# Altium PCB VA_HUB_PCB.PcbDoc (part 1 of 12)
Units mil, origin at the board's own origin, x right, y up, seen from the top; angles counter-clockwise.
Board outline 4408 x 3619 mil, 8 copper layers (Top Layer, Routing 1, Routing 2, Power Plane, GND Plane, Routing 3, Routing 4, Bottom Layer), stack 85.156 mil thick; 569 components, 440 nets, 2911 pads, 1518 vias.
Unrouted connection lines stored in the file: 46.
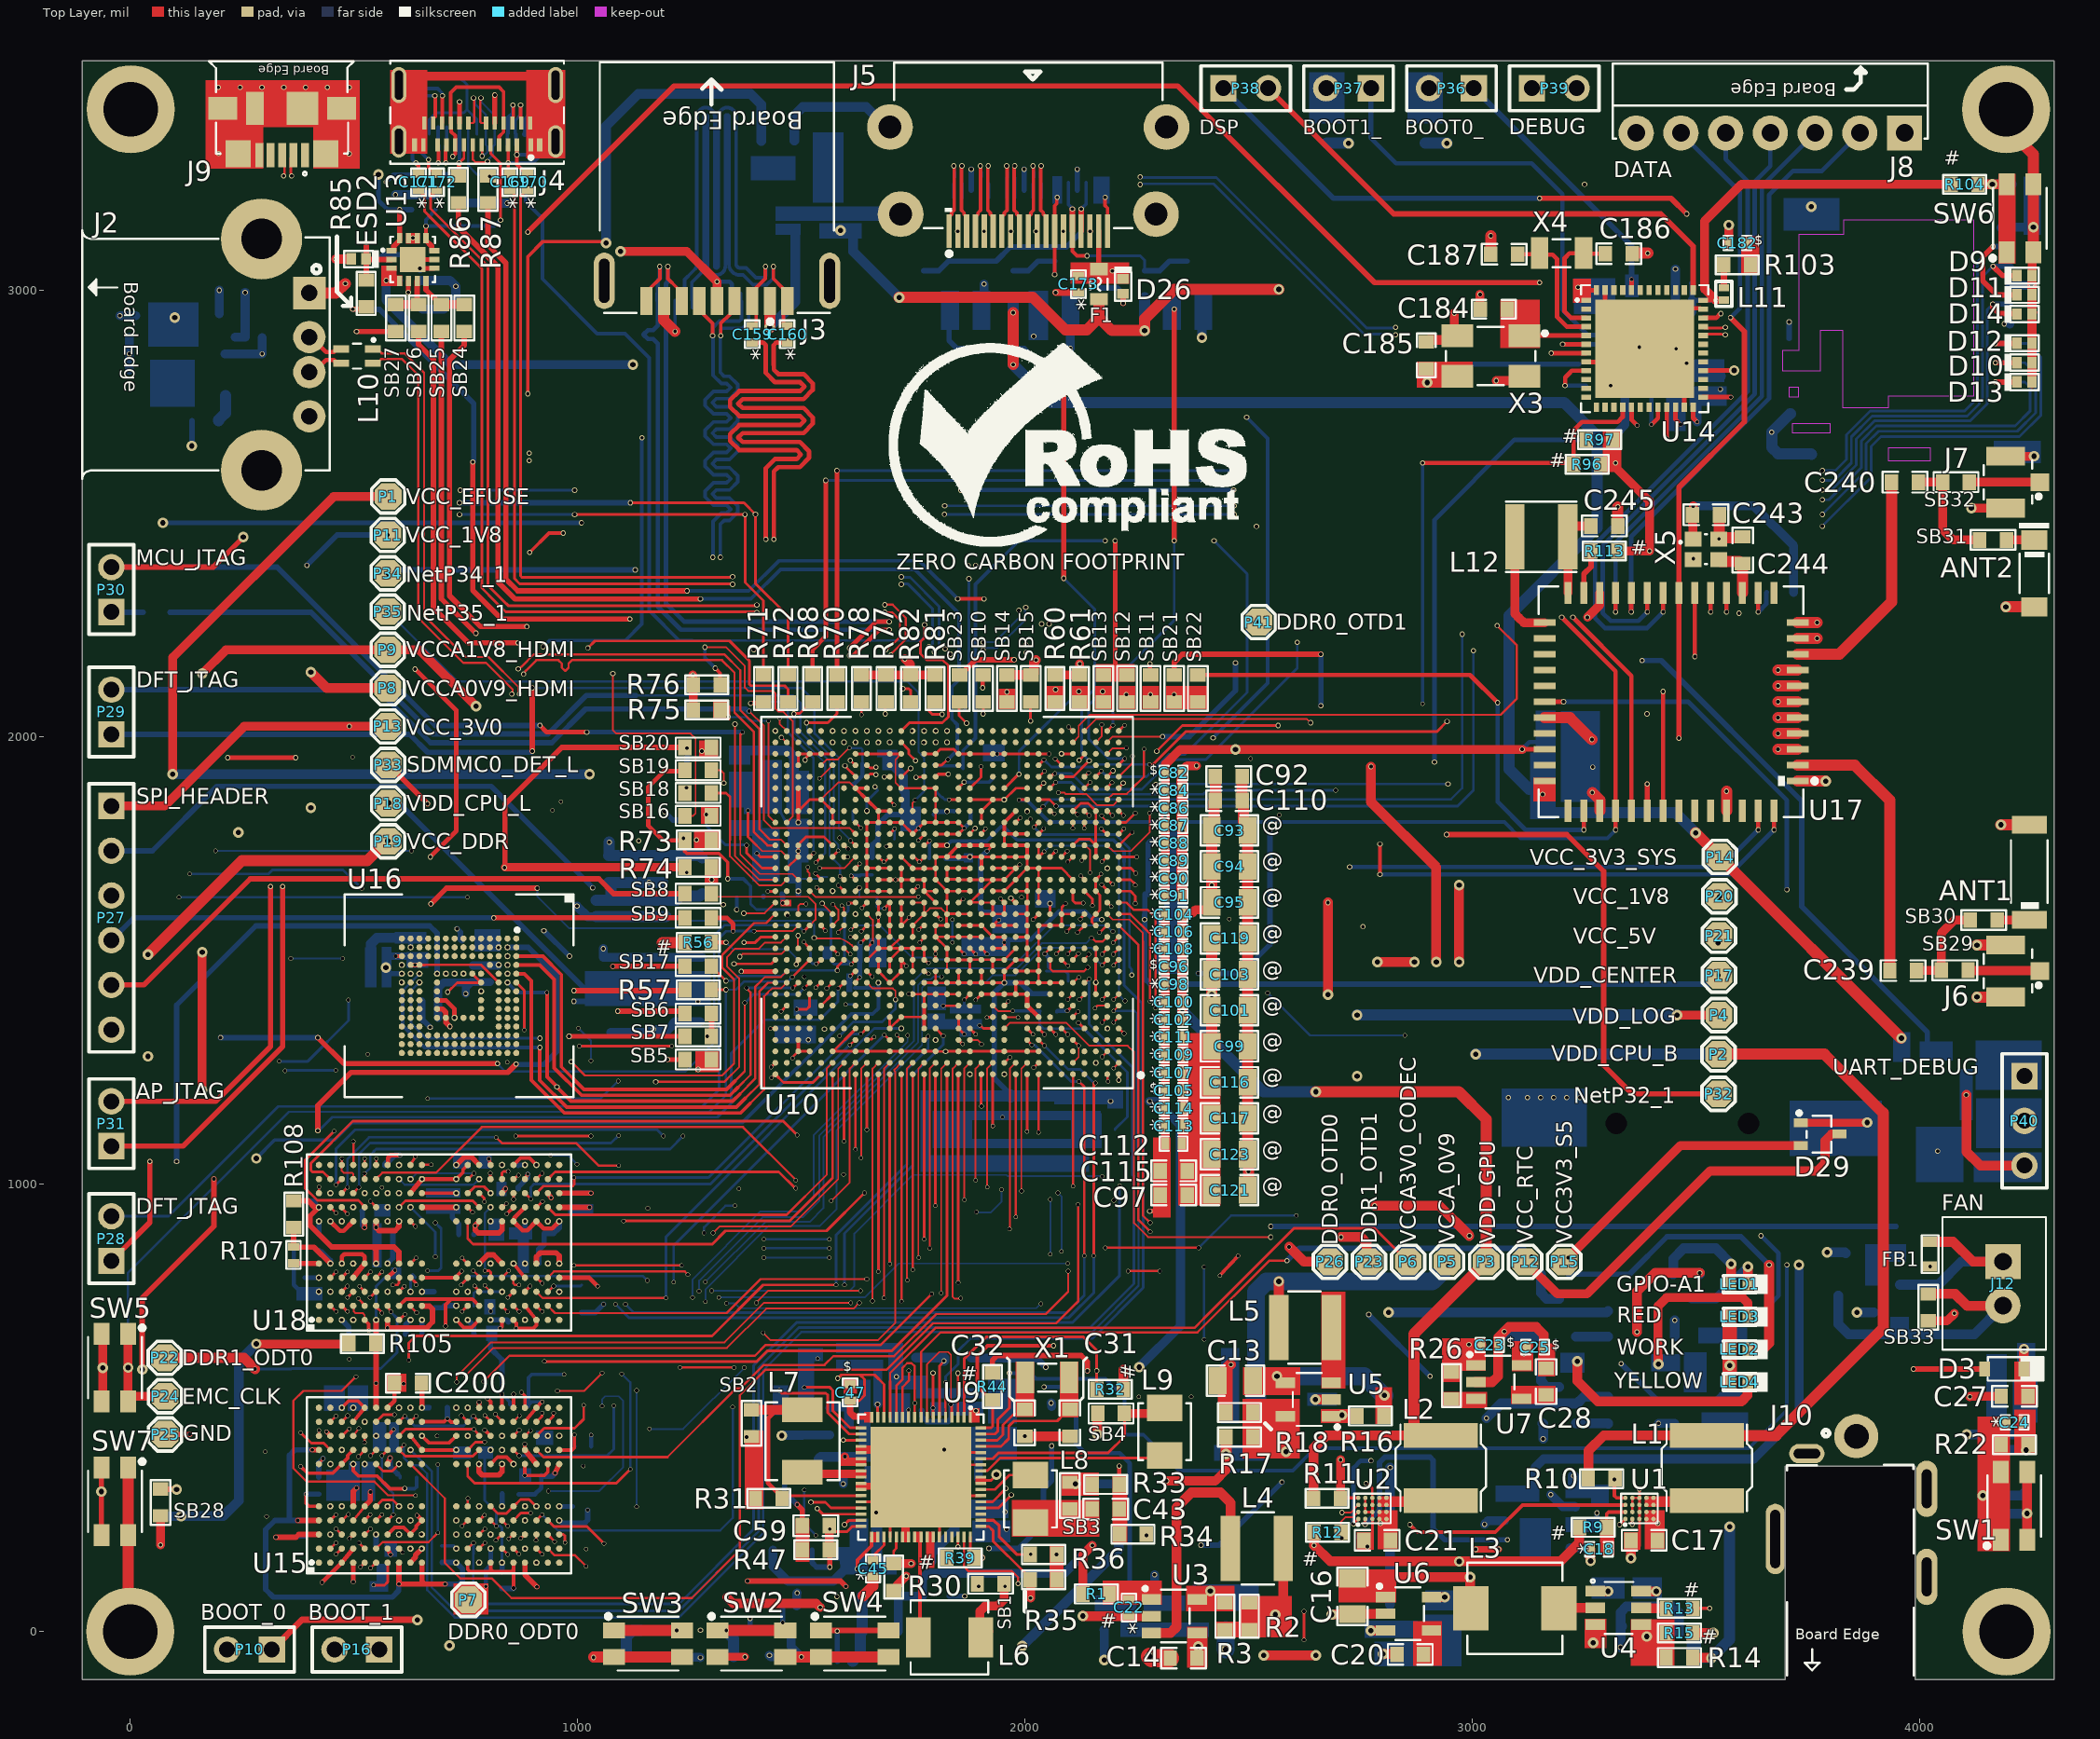
[diagram p0: Top Layer view]
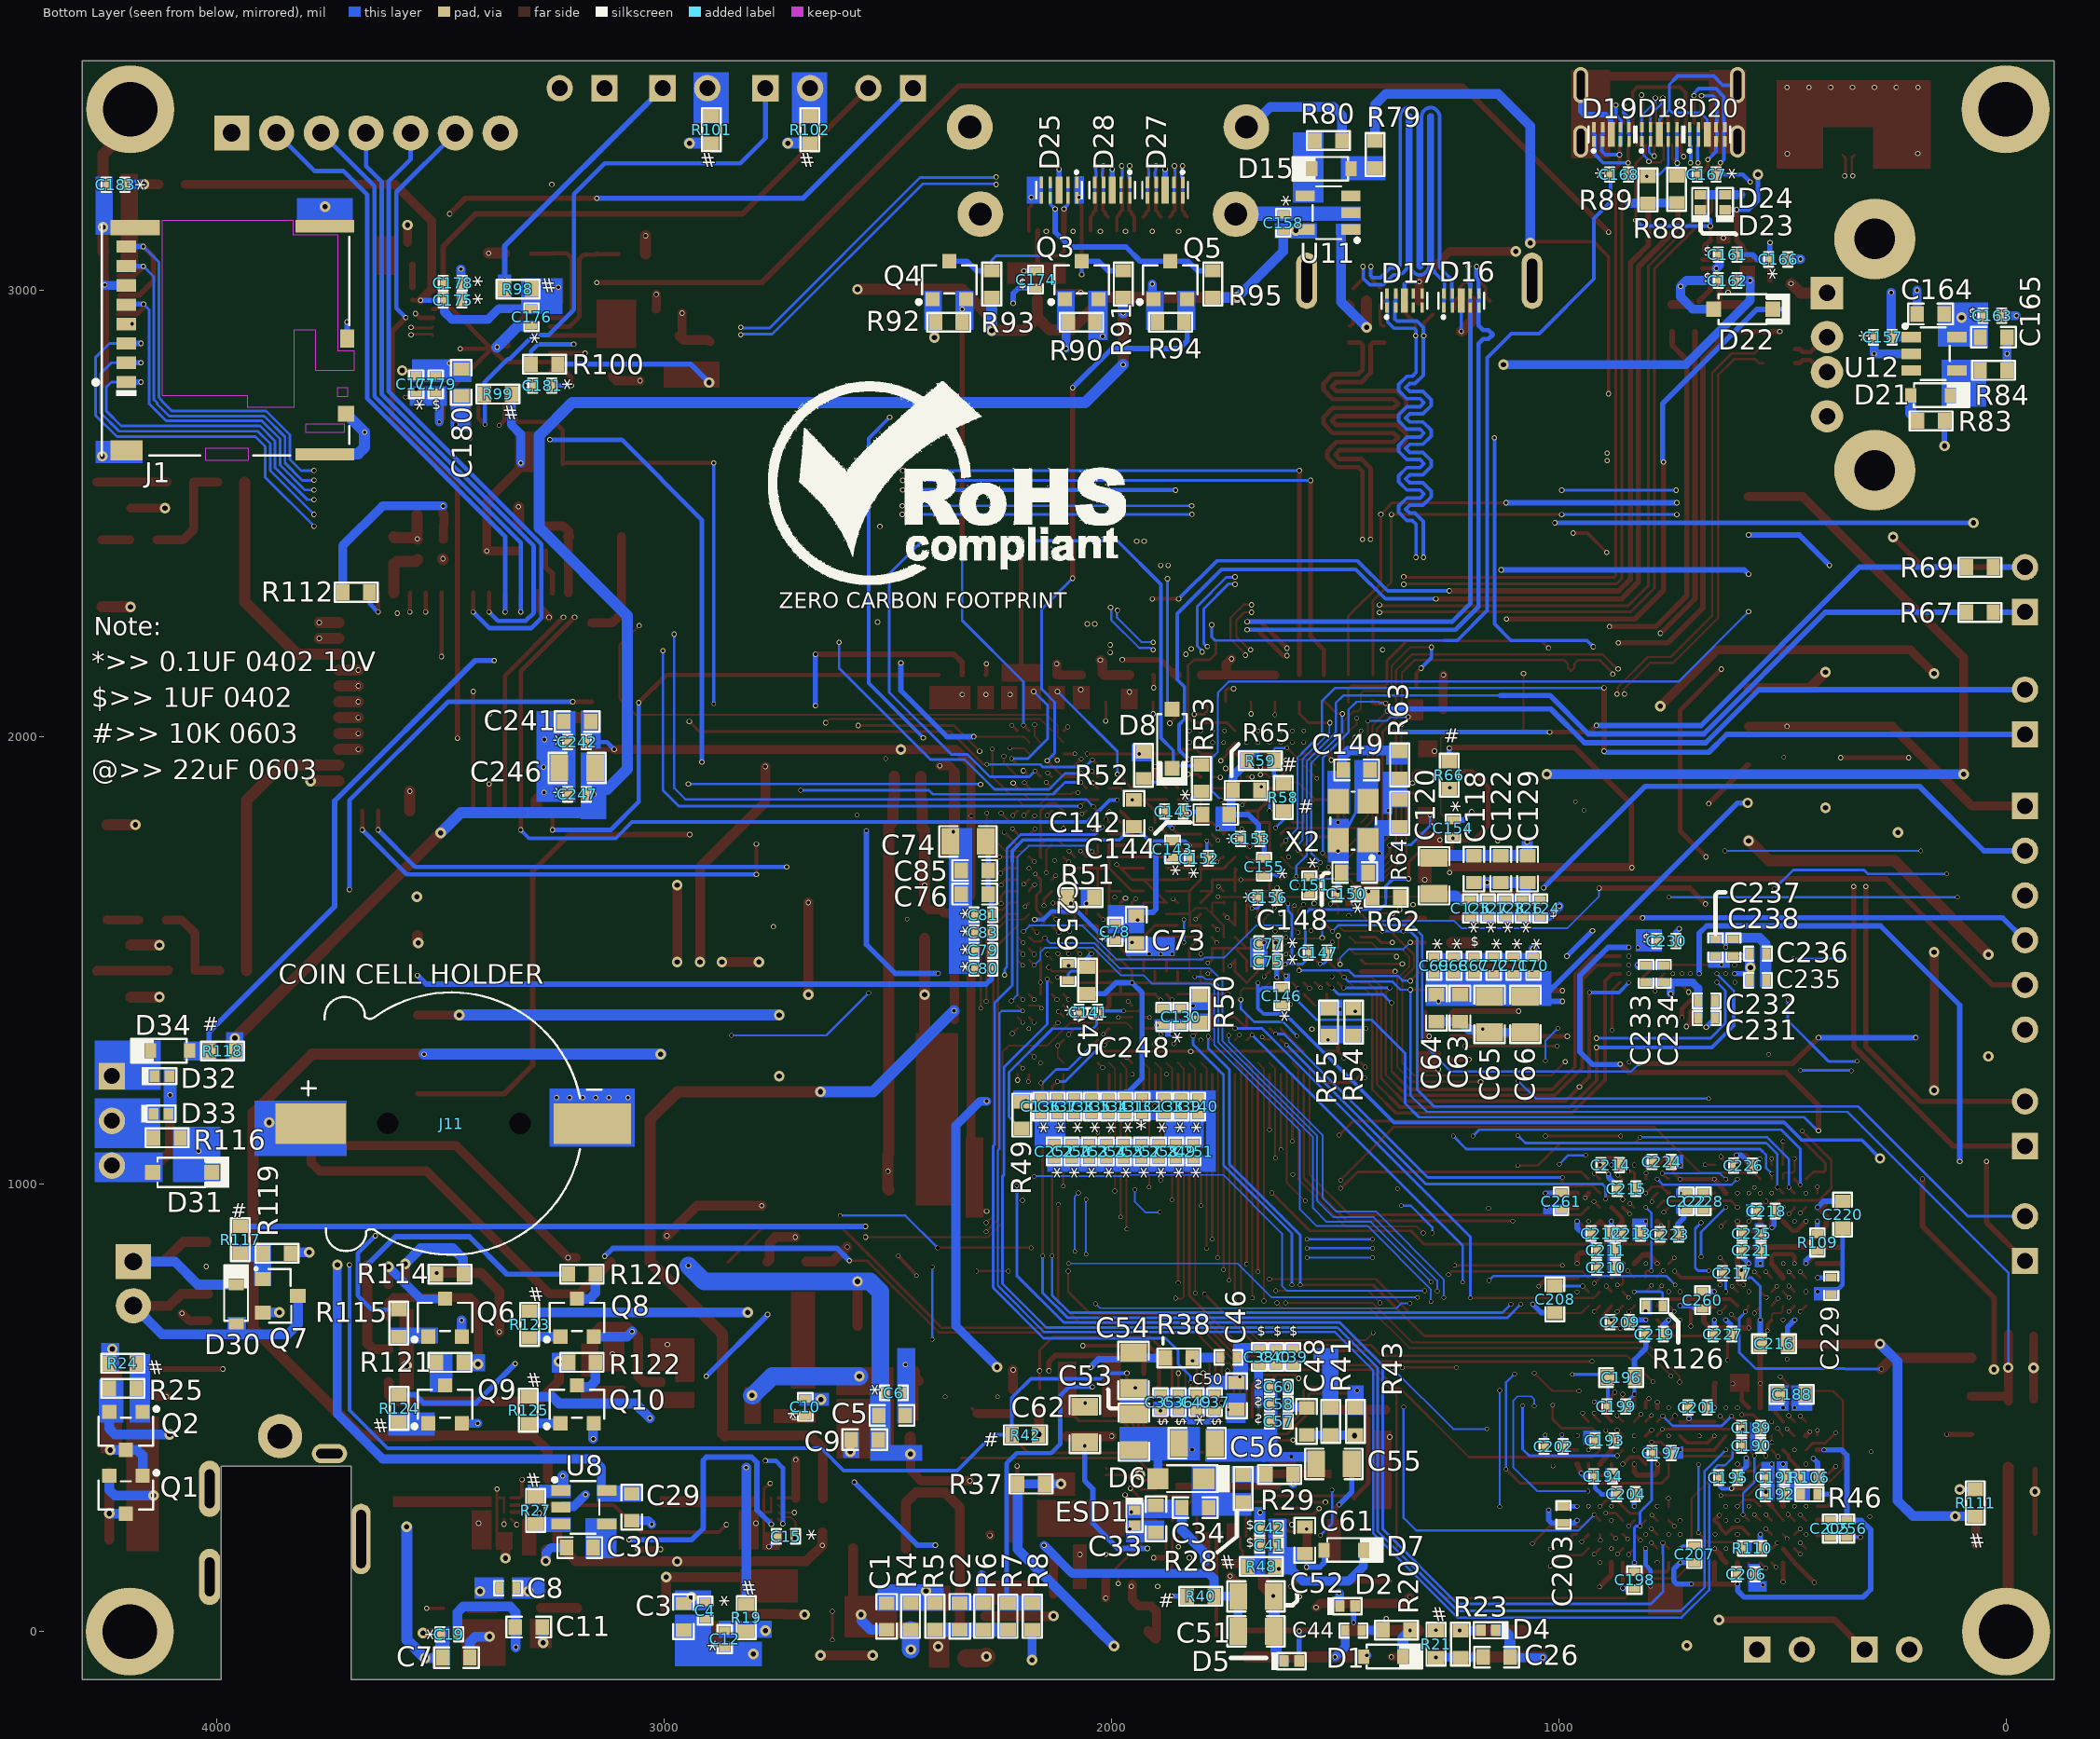
[diagram p1: Bottom Layer view, seen from below]
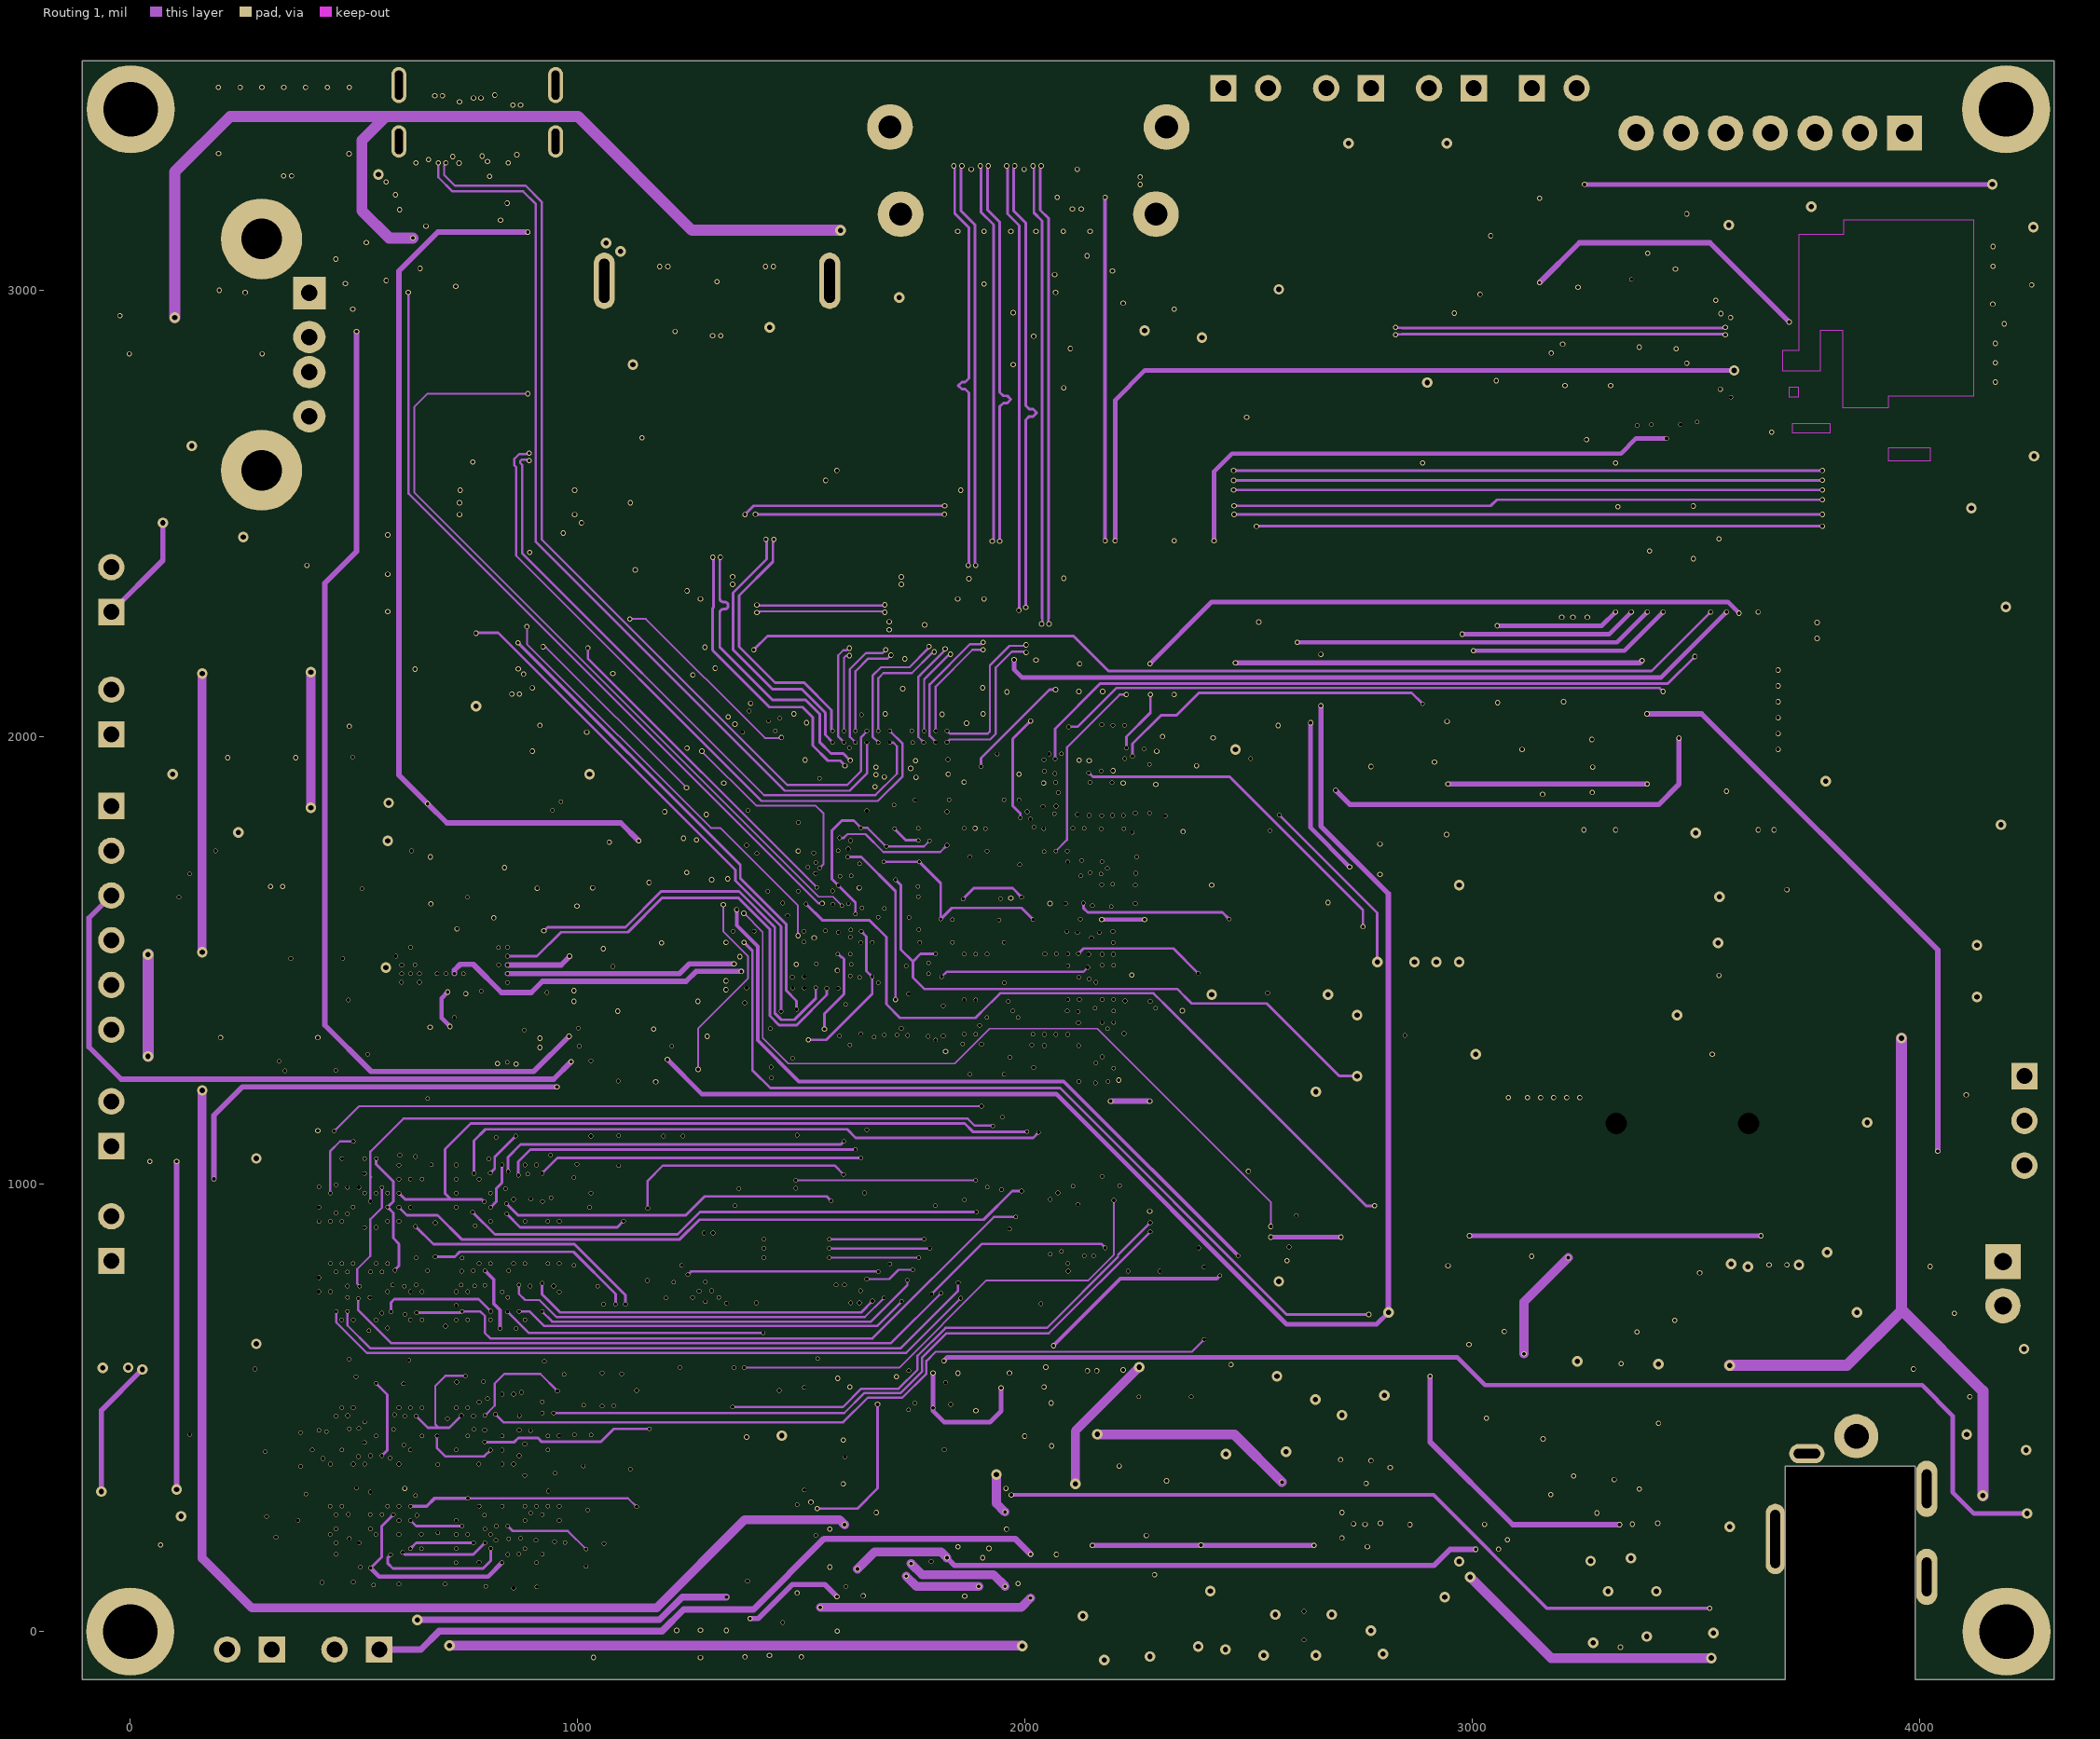
[diagram p2: Routing 1]
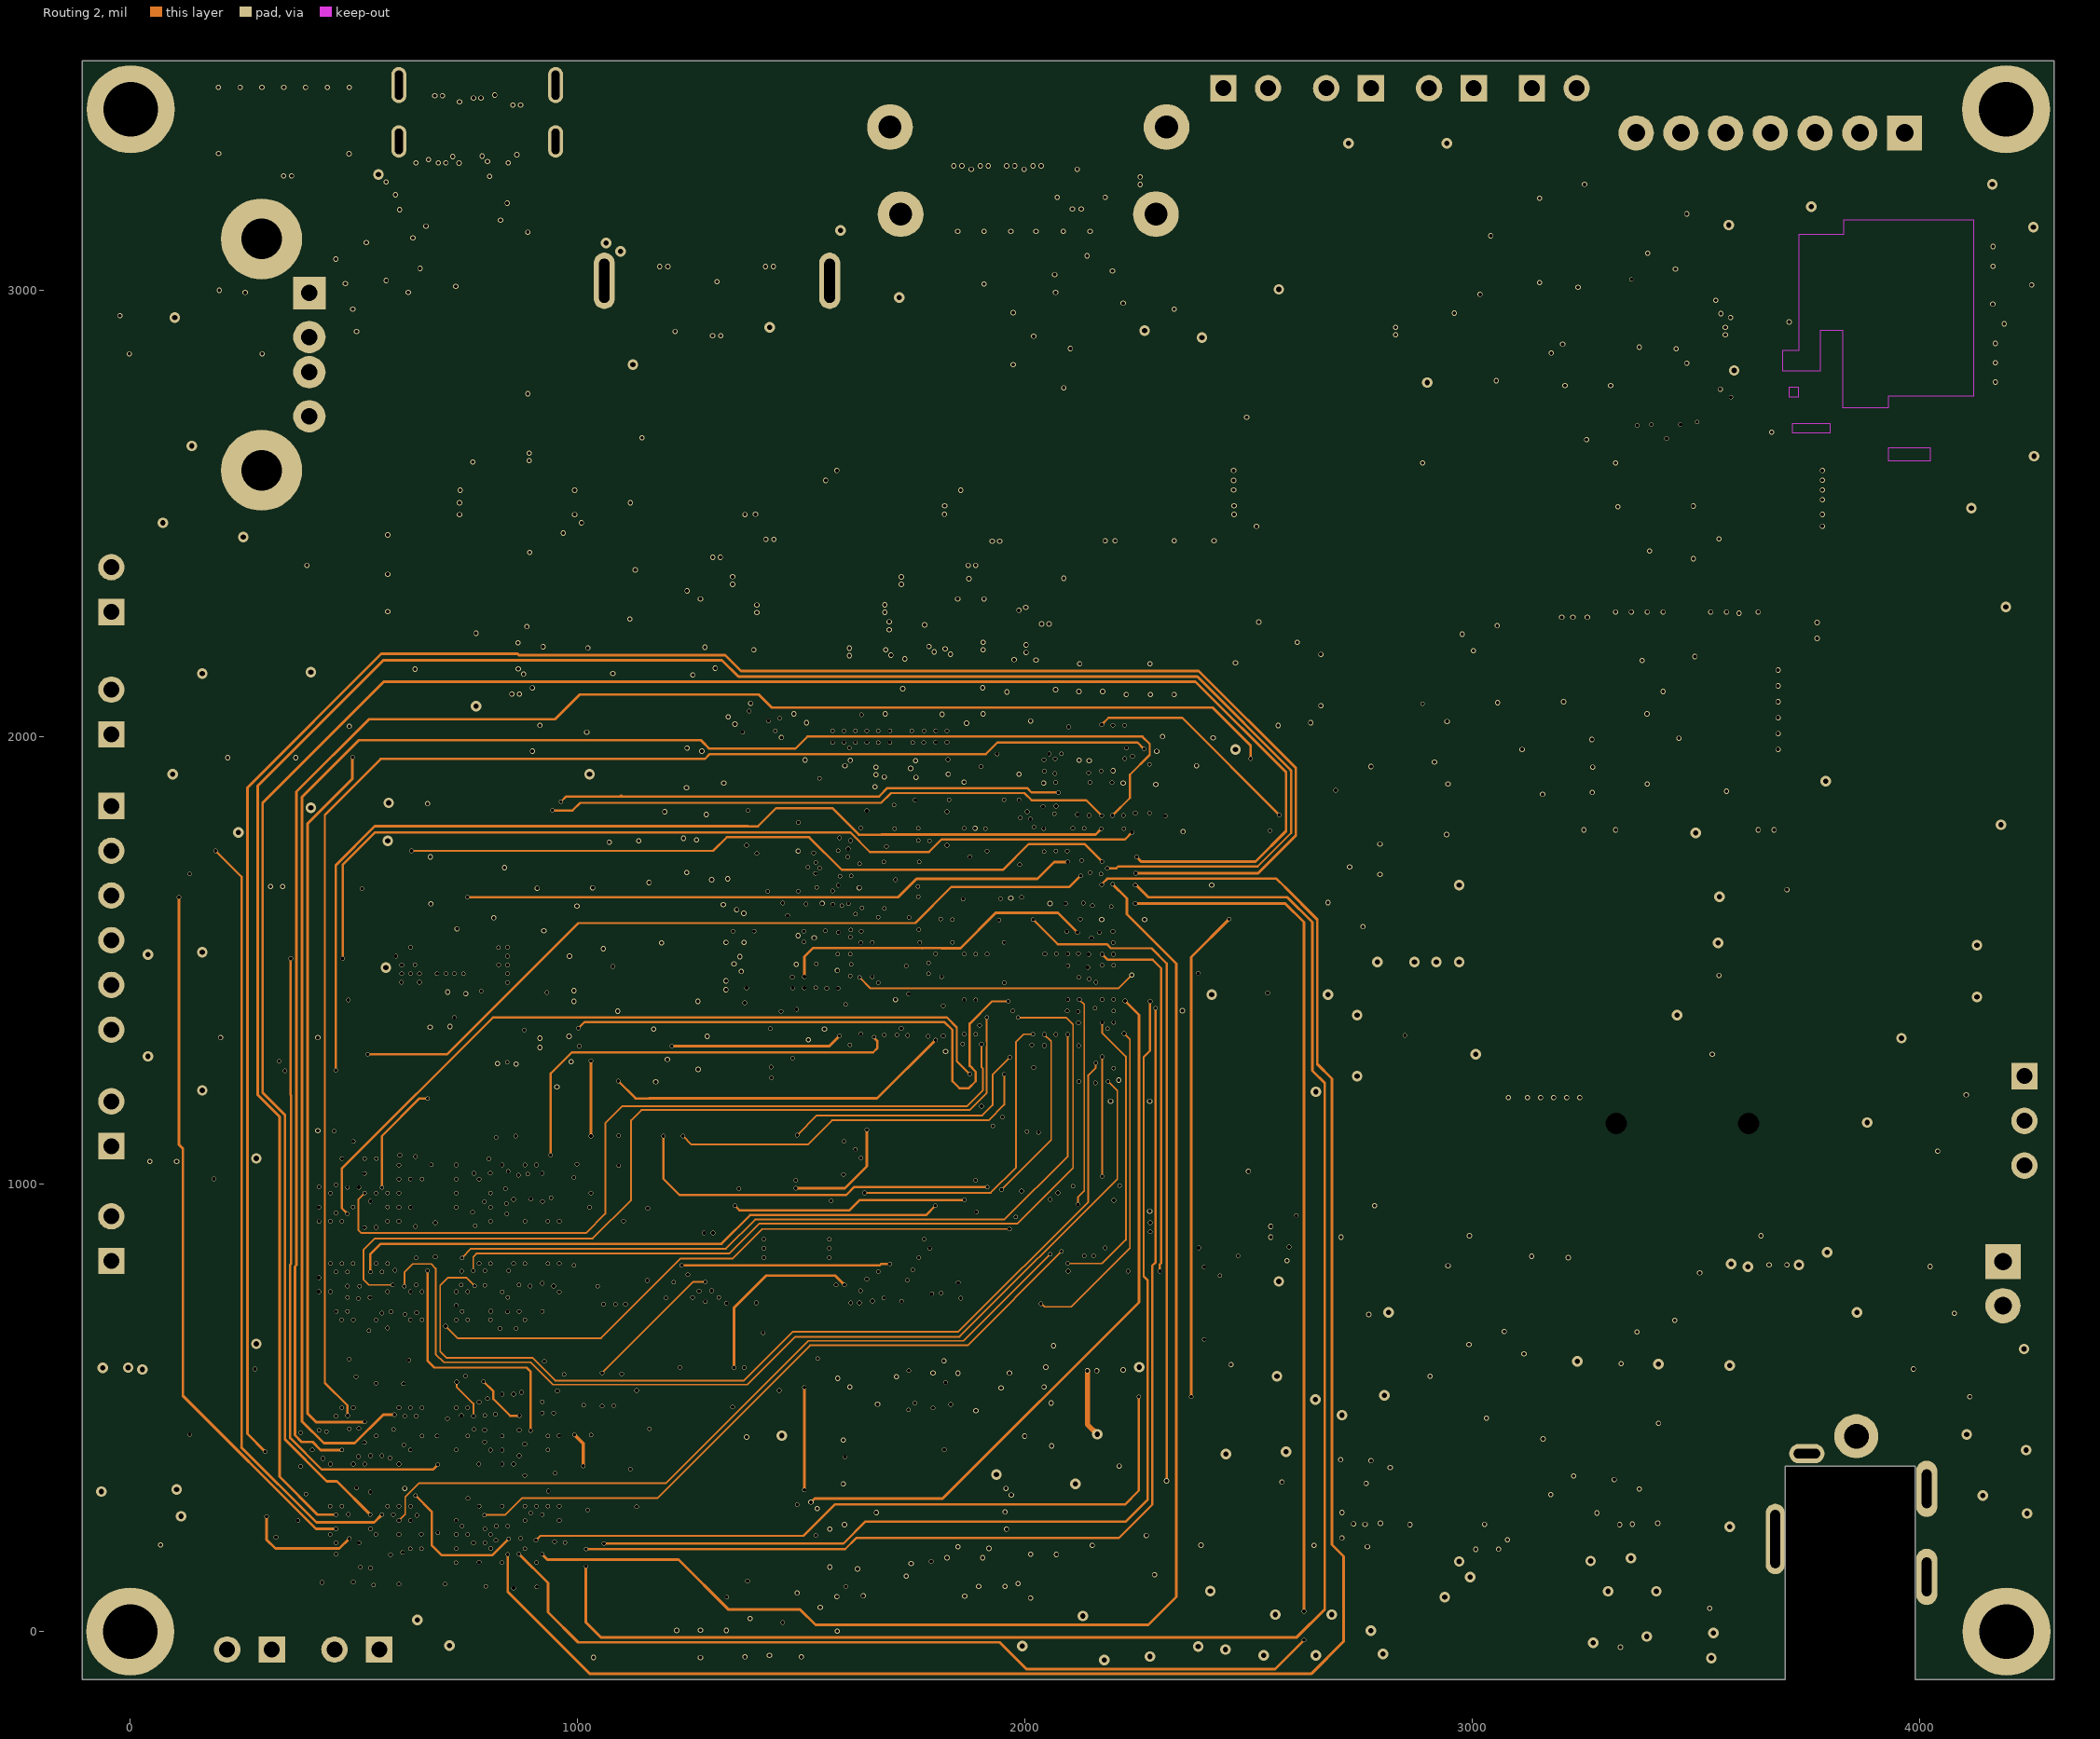
[diagram p3: Routing 2]
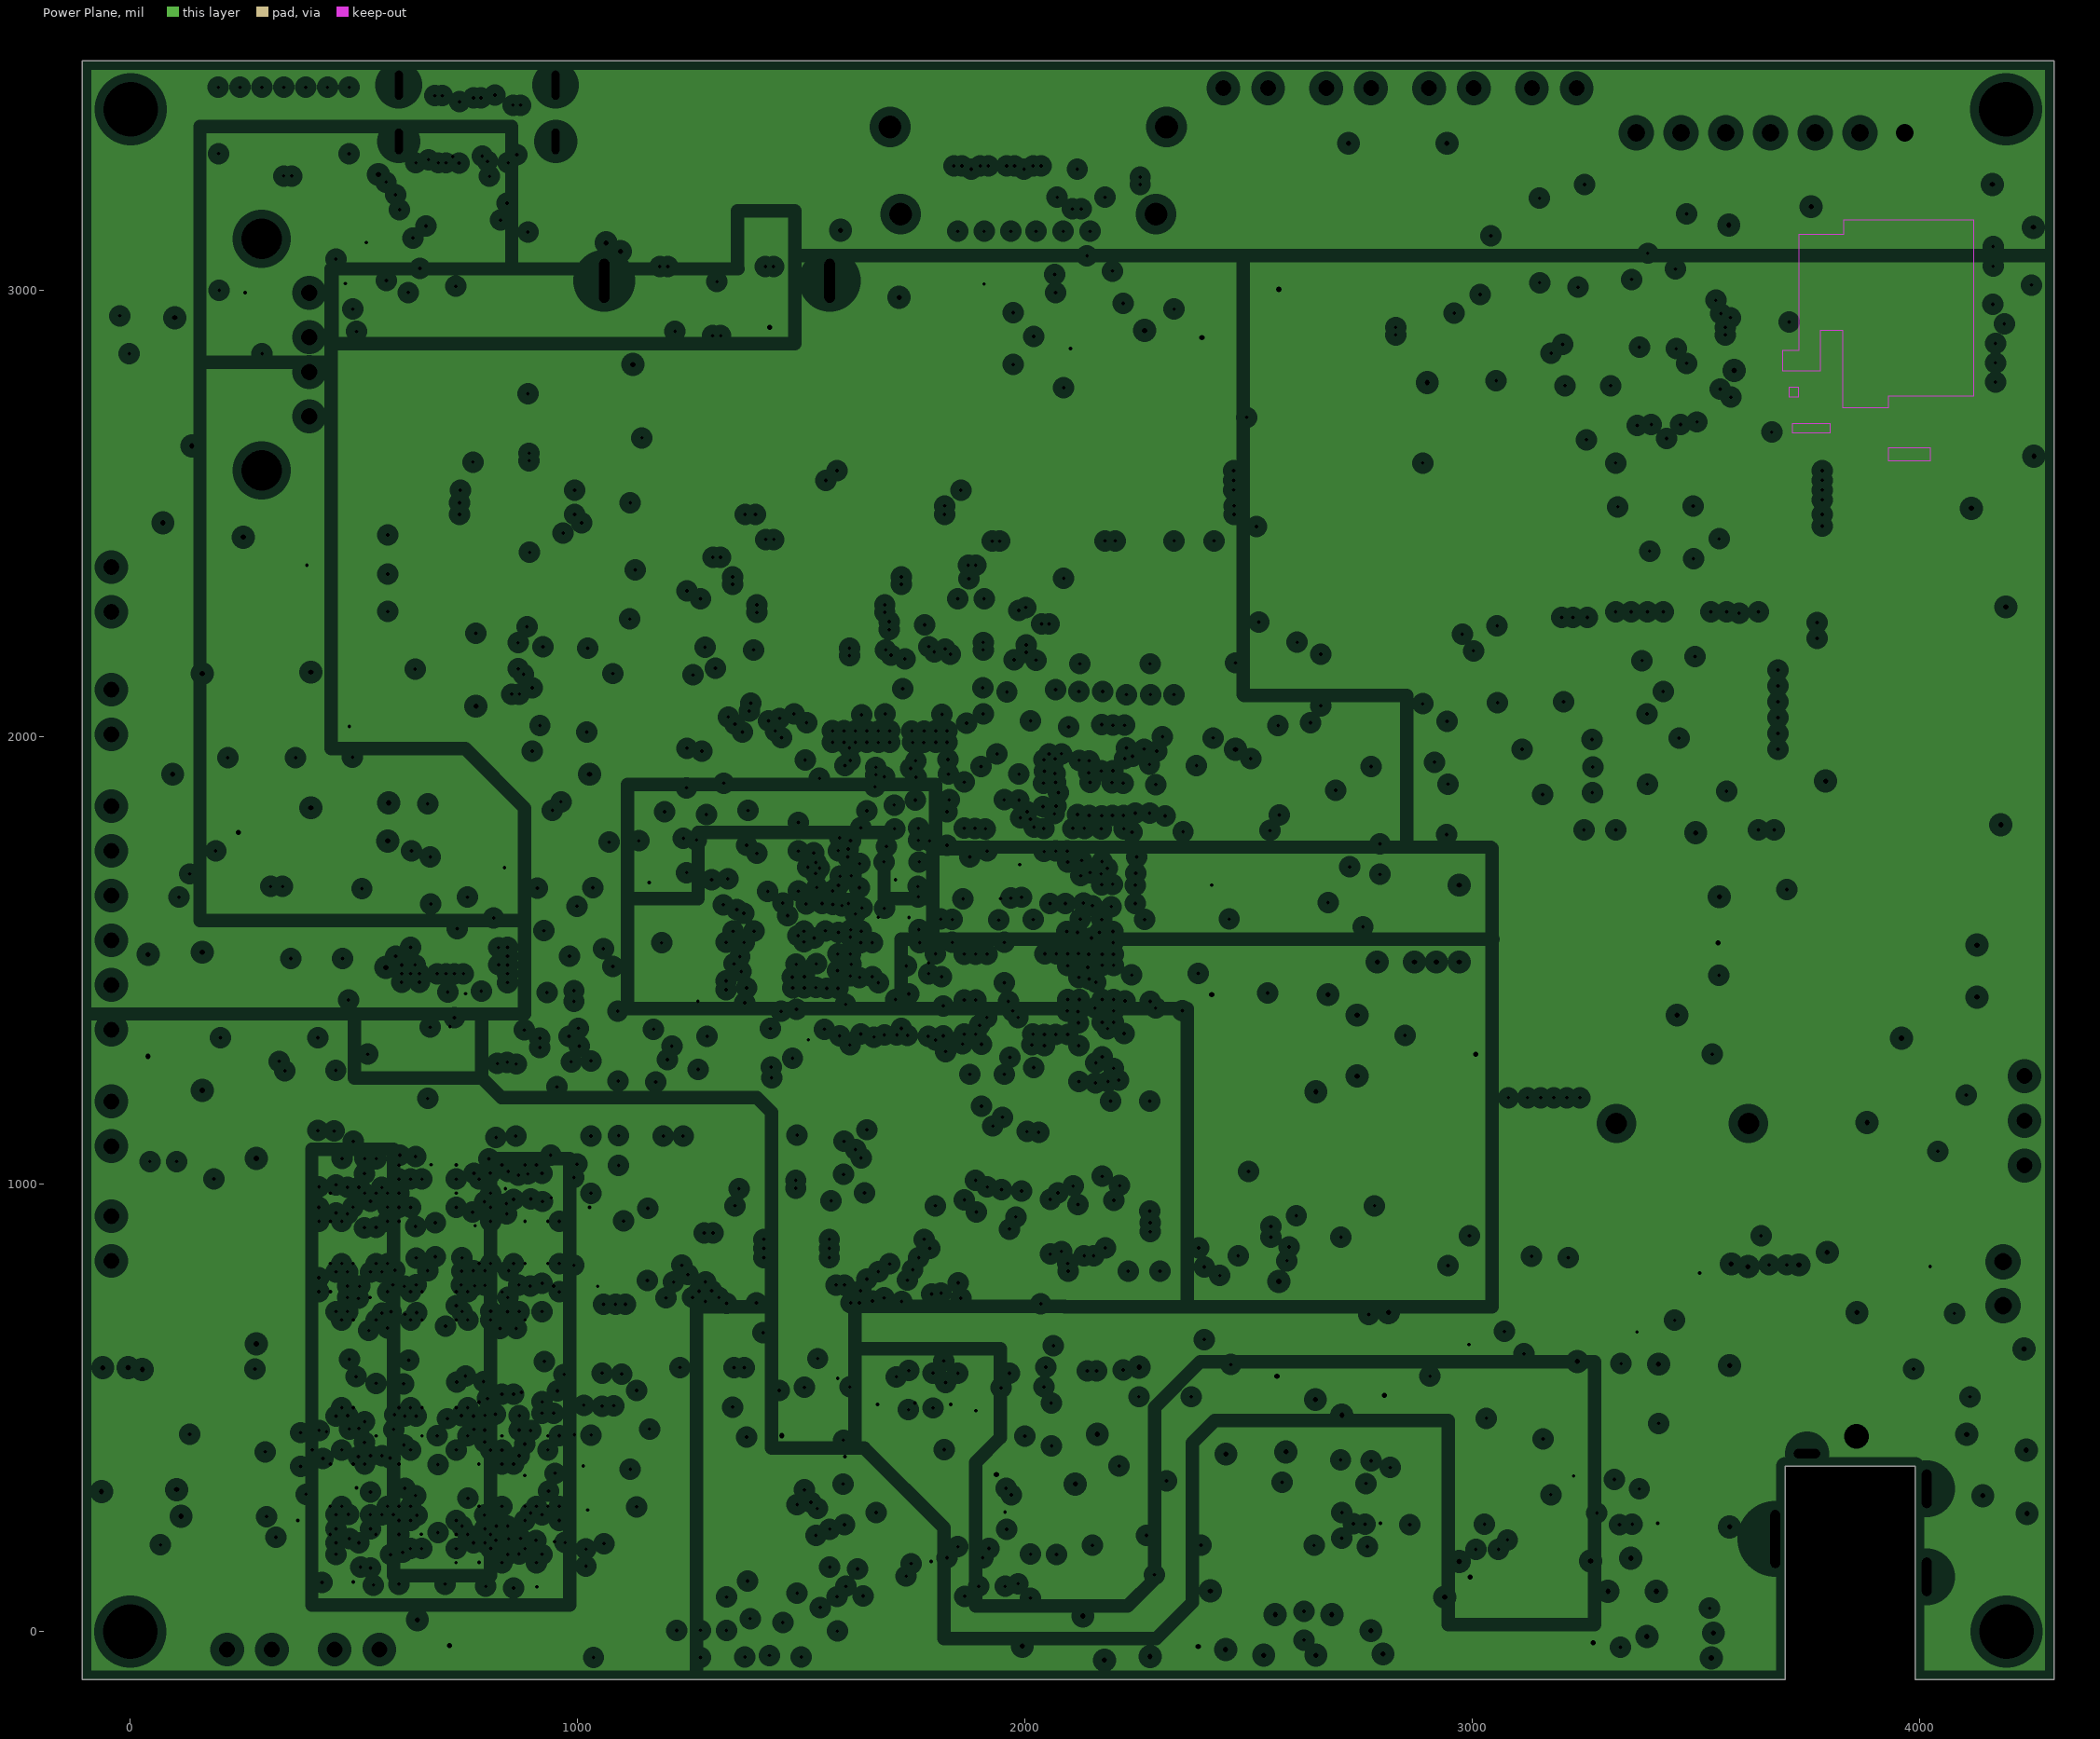
[diagram p4: Power Plane, clearances drawn from the general rule]
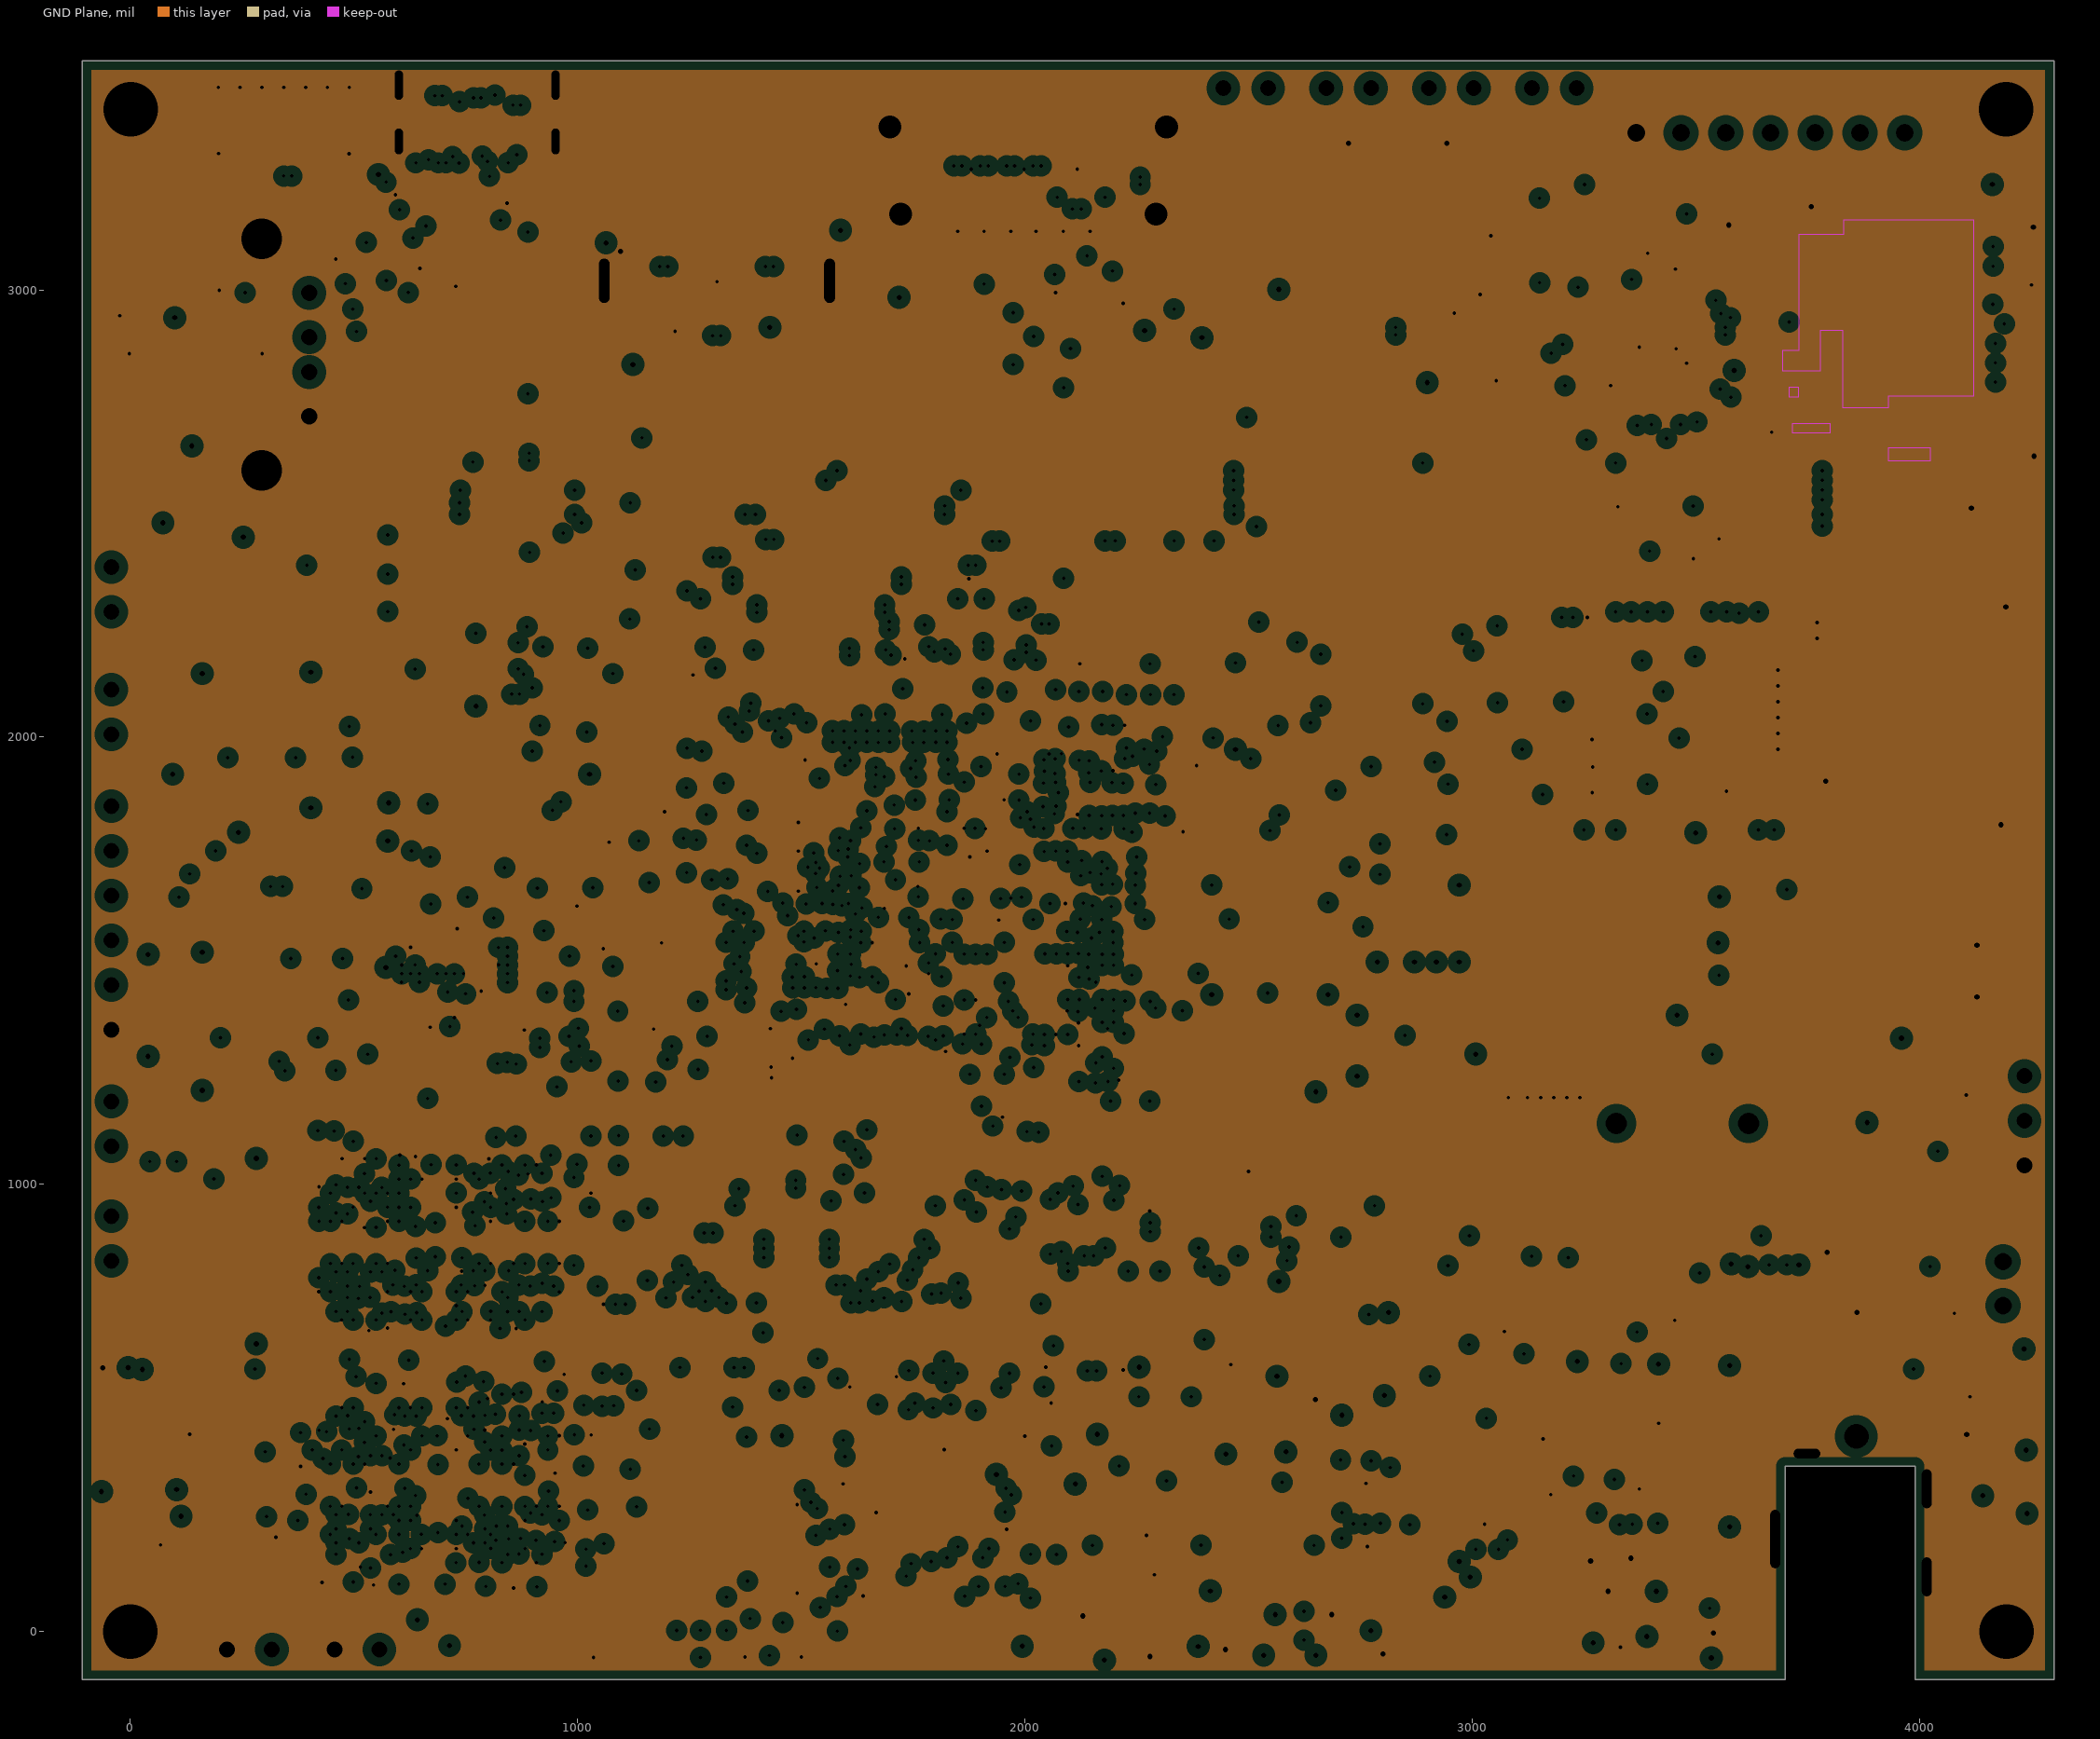
[diagram p5: GND Plane, clearances drawn from the general rule]
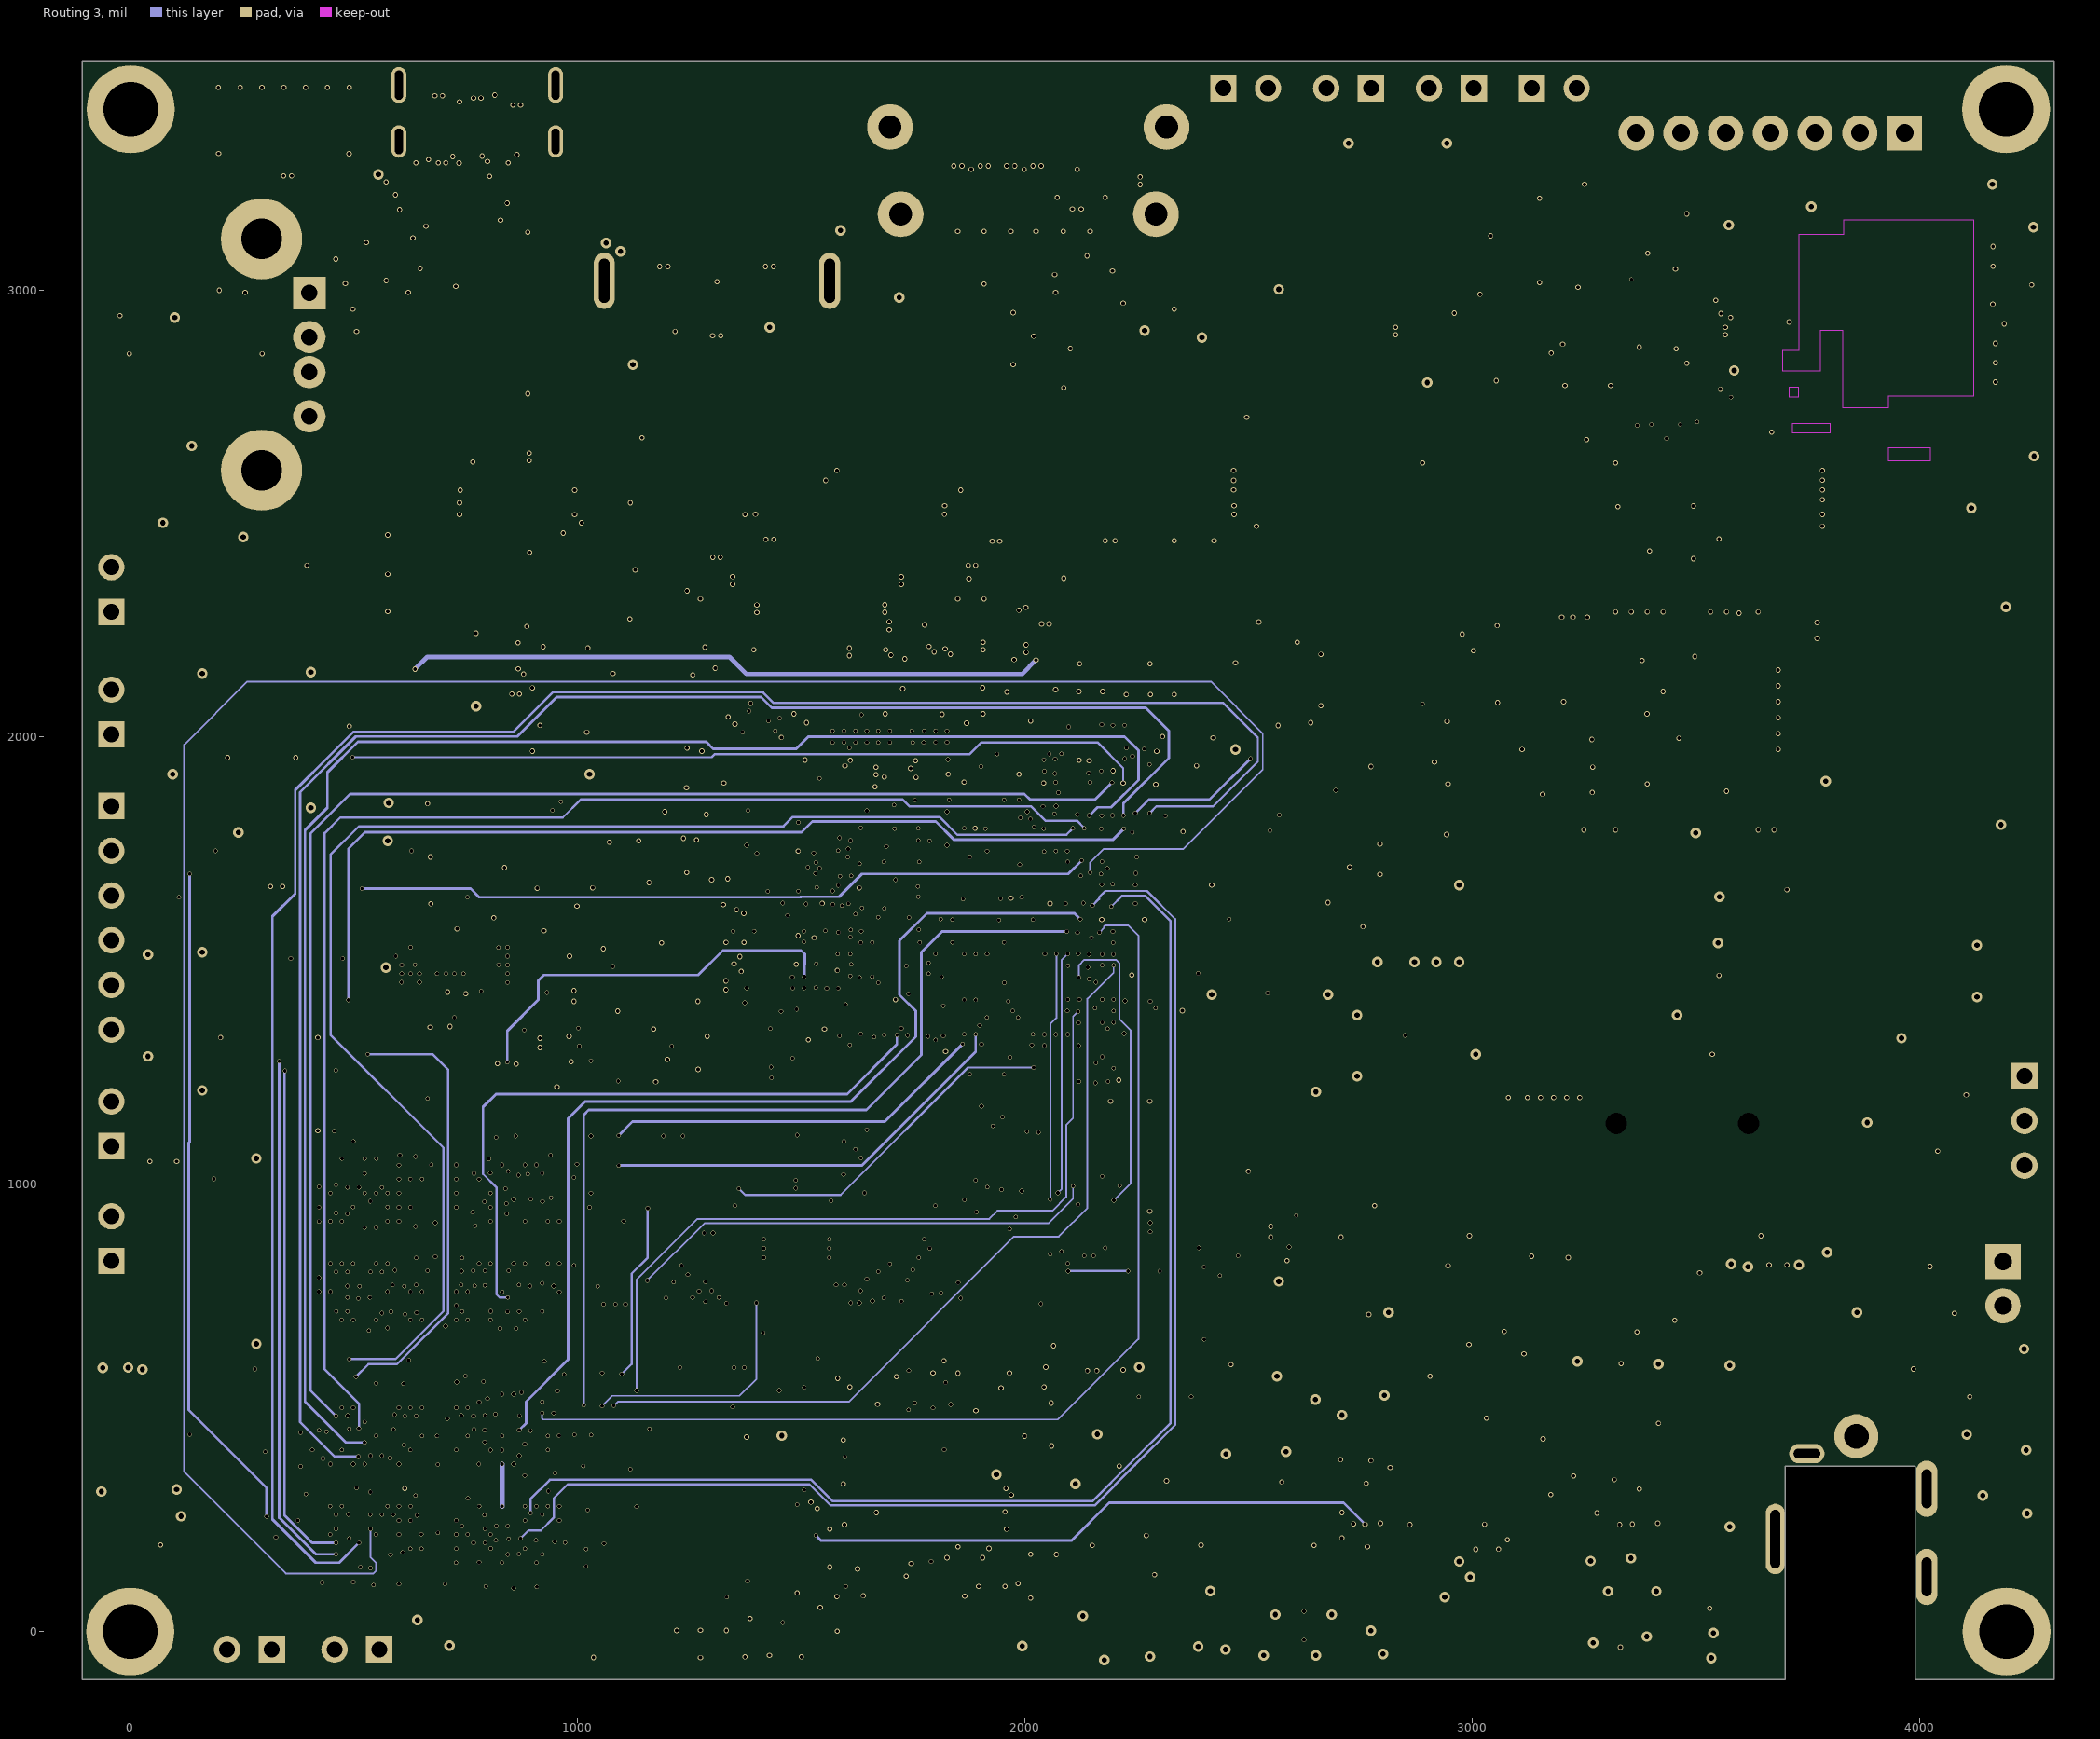
[diagram p6: Routing 3]
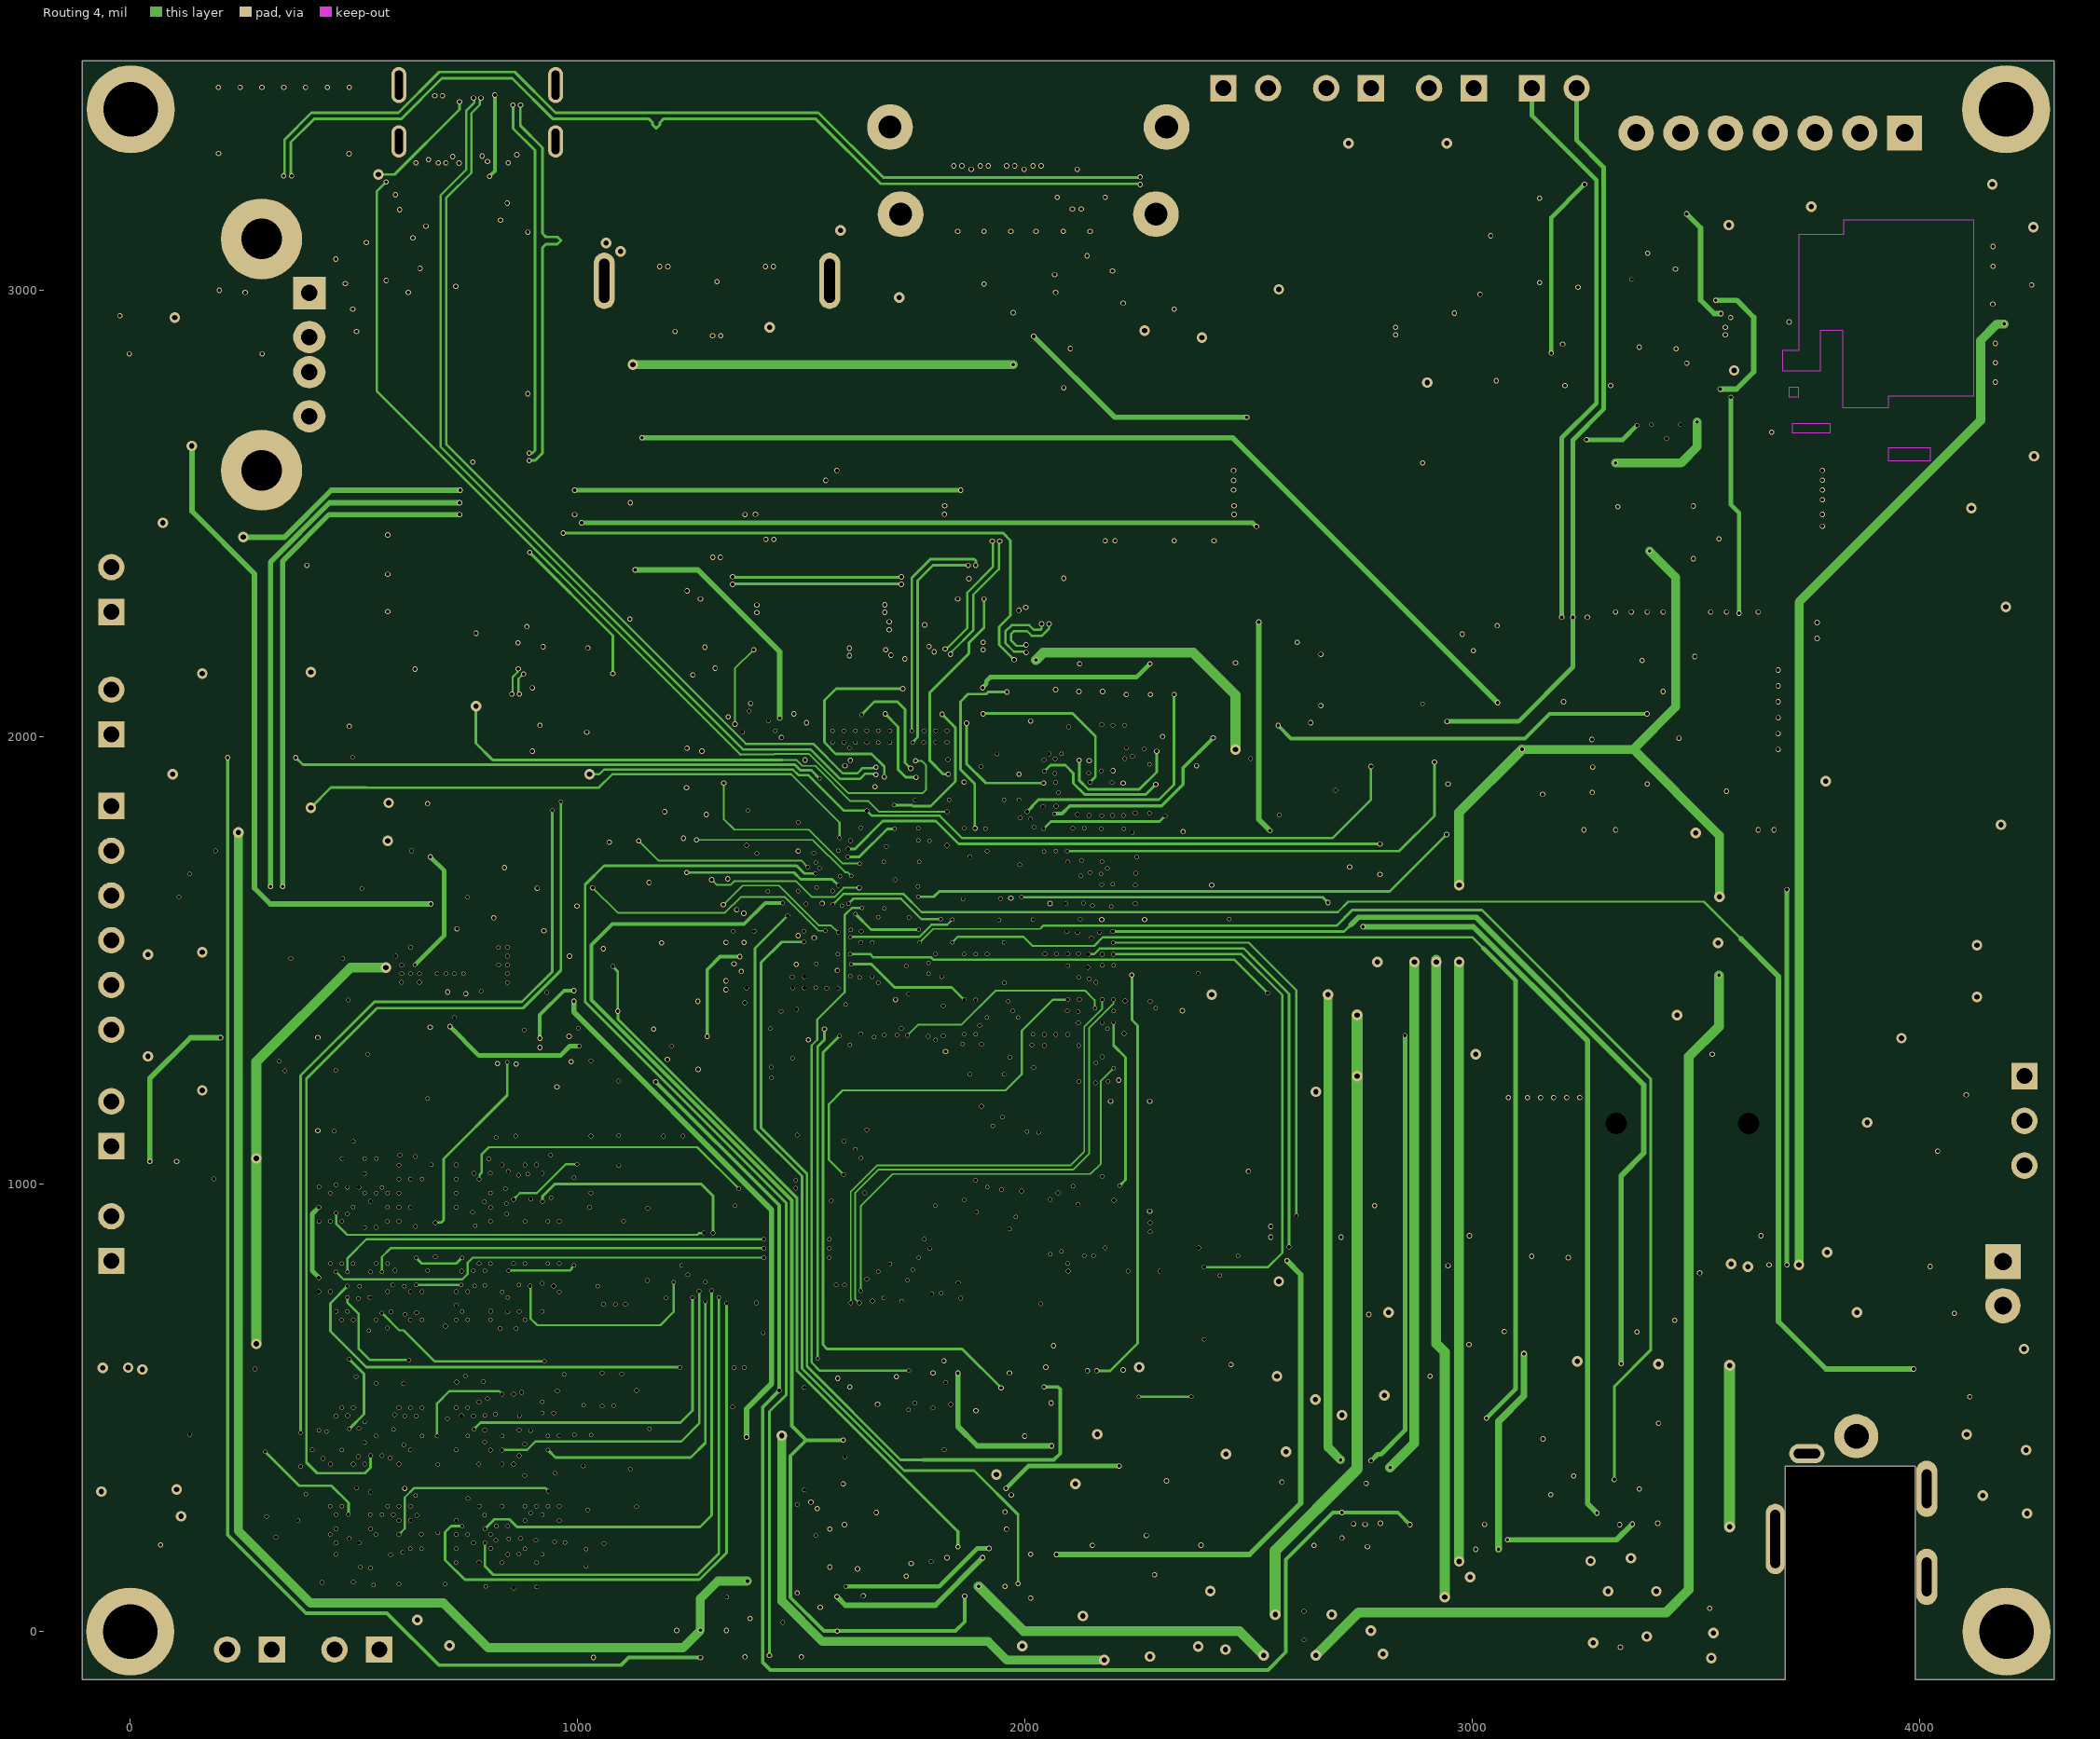
[diagram p7: Routing 4]
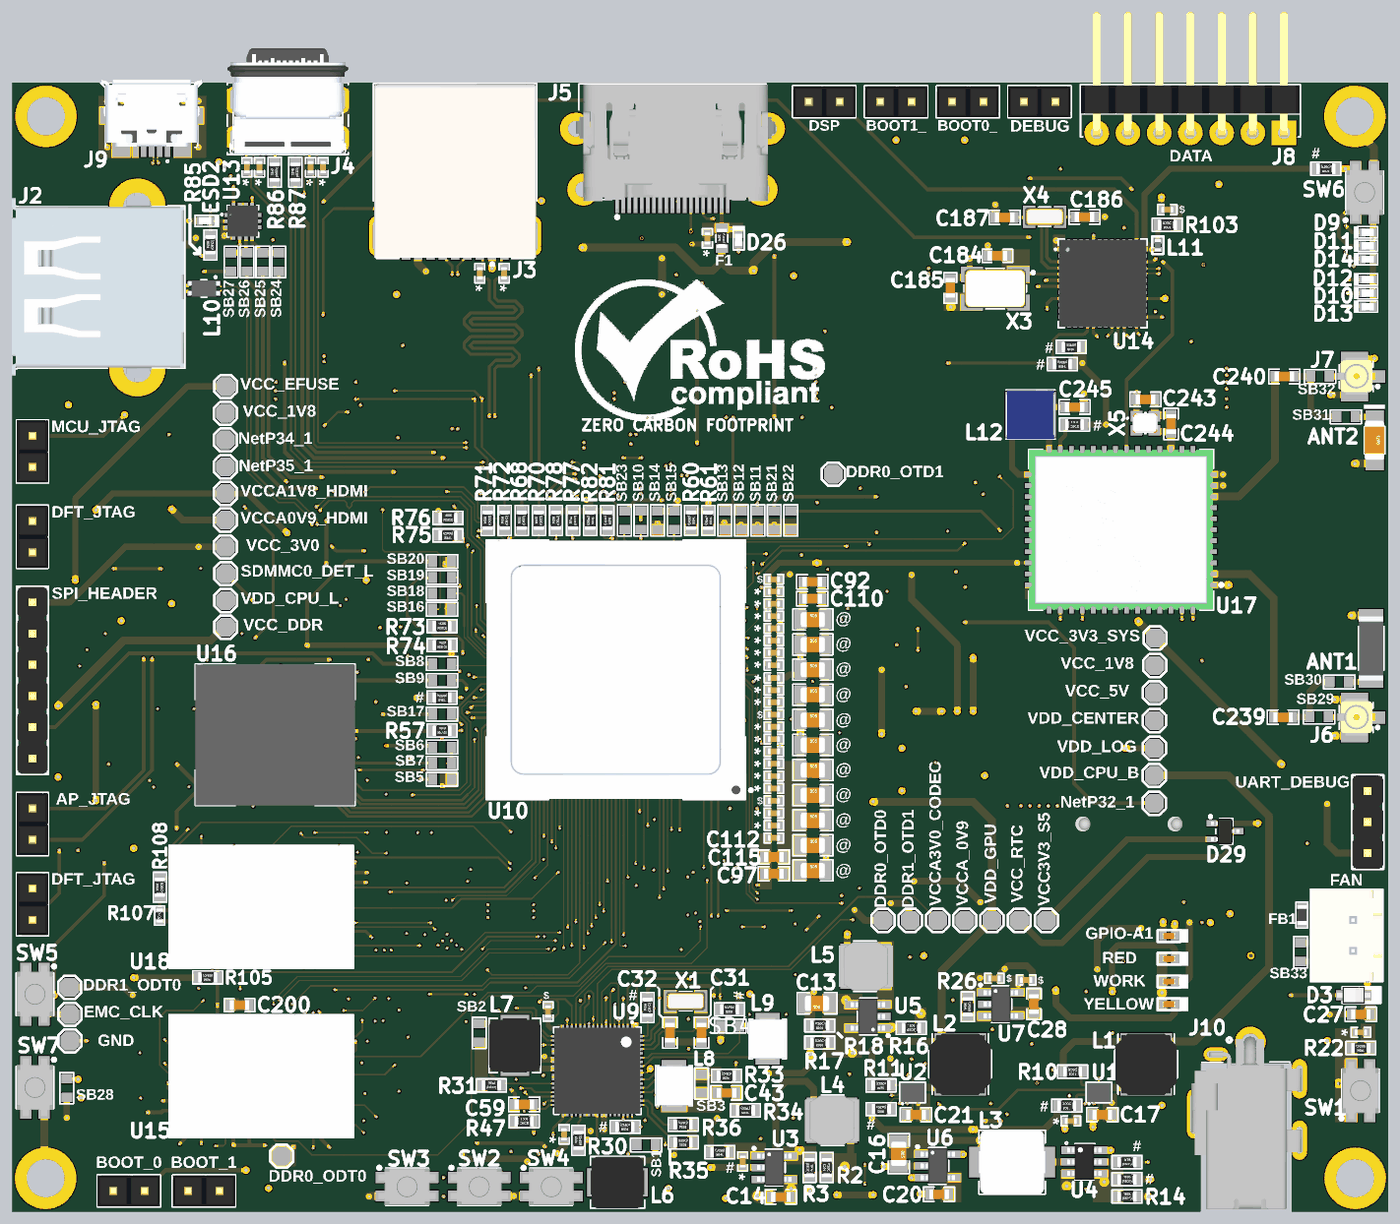
[diagram p16: 3D render of the assembled board from above, using the file's embedded part models]
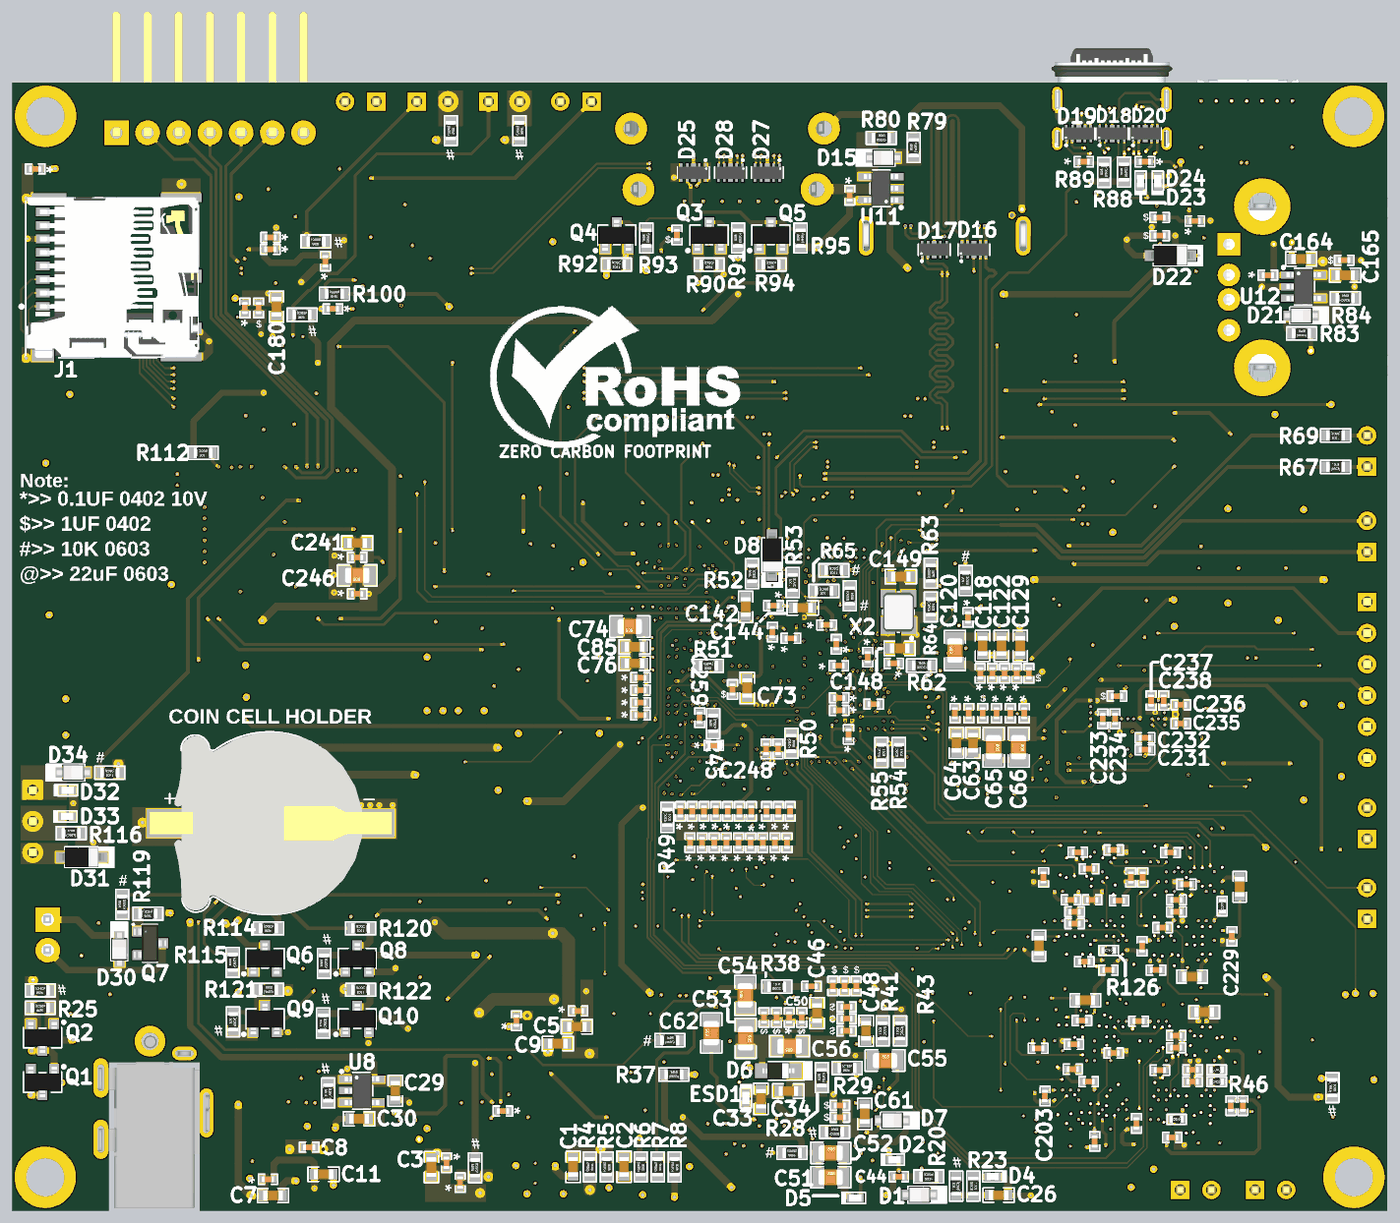
[diagram p17: 3D render of the assembled board from below, using the file's embedded part models]

## Layer stack, top to bottom
Top Solder: solder mask 0.6, Solder Resist, Dk 3.5
Top Layer: signal copper 1.6
Dielectric 2: prepreg 10.1, PP-007, Dk 4.2
Routing 1: signal copper 1.6
Dielectric 4: prepreg 17, PP-006, Dk 4.1
Routing 2: signal copper 1.378
Dielectric 6: prepreg 2.8, PP-006, Dk 4.1
Power Plane: plane copper 1.6, net (Multiple Nets)
Dielectric 1: core 13, FR-4, Dk 4.8
GND Plane: plane copper 1.6, net GND
Dielectric 7: prepreg 2.8, PP-006, Dk 4.1
Routing 3: signal copper 1.378
Dielectric 5: prepreg 17, PP-006, Dk 4.1
Routing 4: signal copper 1.6
Dielectric 3: prepreg 10.1, PP-007, Dk 4.2
Bottom Layer: signal copper 1.6
Bottom Solder: solder mask 0.6, Solder Resist, Dk 3.5

## Board outline
-107.18,-107.18 -107.18,3511.82 4300.82,3511.82 4300.82,-107.18 3990.82,-107.18 3990.82,369.82 3699.57,369.82 3699.57,-107.18

## Design rules (kind name [scope] priority, off if disabled: settings)
Clearance [All] p1: gap=5 ignorepadtopadclearanceinfootprint=FALSE except(4: Arc-SMDPad Track-SMDPad SMDPad-SMDPad)
Clearance Clearance_BGA3 [WithinRoom('BGA_3')] p2: gap=3 ignorepadtopadclearanceinfootprint=FALSE
Clearance Clearance_BGA2 [WithinRoom('BGA_2')] p3: gap=3 ignorepadtopadclearanceinfootprint=FALSE
Clearance Clearance_BGA1 [WithinRoom('BGA_1')] p4: gap=3 ignorepadtopadclearanceinfootprint=FALSE
Clearance Clearance_BGA [WithinRoom('BGA')] p5: gap=3 ignorepadtopadclearanceinfootprint=FALSE
ComponentClearance [All] p1: gap=0 collisioncheckmode=3 verticalgap=0 showdistances=FALSE
DiffPairsRouting DiffPairsRouting_7 [InDifferentialPairClass('TYPEC0_TX_Lines')] p1: maxlimit=10 minlimit=10 mostfreqgap=10 toplayer_minwidth=15 toplayer_maxwidth=15 toplayer_prefwidth=15 midlayer1_minwidth=15 midlayer1_maxwidth=15 midlayer1_prefwidth=15 midlayer2_minwidth=15 midlayer2_maxwidth=15 midlayer2_prefwidth=15 midlayer3_minwidth=15 midlayer3_maxwidth=15 midlayer3_prefwidth=15 midlayer4_minwidth=15 midlayer4_maxwidth=15 midlayer4_prefwidth=15 bottomlayer_minwidth=15 bottomlayer_maxwidth=15 bottomlayer_prefwidth=15 maxuncoupledlength=500
DiffPairsRouting [InDifferentialPairClass('TYPEC0_AUX_Lines')] p2: maxlimit=10 minlimit=10 mostfreqgap=10 toplayer_minwidth=15 toplayer_maxwidth=15 toplayer_prefwidth=15 midlayer1_minwidth=15 midlayer1_maxwidth=15 midlayer1_prefwidth=15 midlayer2_minwidth=15 midlayer2_maxwidth=15 midlayer2_prefwidth=15 midlayer3_minwidth=15 midlayer3_maxwidth=15 midlayer3_prefwidth=15 midlayer4_minwidth=15 midlayer4_maxwidth=15 midlayer4_prefwidth=15 bottomlayer_minwidth=15 bottomlayer_maxwidth=15 bottomlayer_prefwidth=15 maxuncoupledlength=500
DiffPairsRouting DiffPairsRouting_6 [InDifferentialPairClass('USB_A_Lines')] p3: maxlimit=10 minlimit=10 mostfreqgap=10 toplayer_minwidth=15 toplayer_maxwidth=15 toplayer_prefwidth=15 midlayer1_minwidth=15 midlayer1_maxwidth=15 midlayer1_prefwidth=15 midlayer2_minwidth=15 midlayer2_maxwidth=15 midlayer2_prefwidth=15 midlayer3_minwidth=15 midlayer3_maxwidth=15 midlayer3_prefwidth=15 midlayer4_minwidth=15 midlayer4_maxwidth=15 midlayer4_prefwidth=15 bottomlayer_minwidth=15 bottomlayer_maxwidth=15 bottomlayer_prefwidth=15 maxuncoupledlength=500
DiffPairsRouting DiffPairsRouting_5 [InDifferentialPairClass('TYPEC1_IO_Lines')] p4: maxlimit=10 minlimit=10 mostfreqgap=10 toplayer_minwidth=15 toplayer_maxwidth=15 toplayer_prefwidth=15 midlayer1_minwidth=15 midlayer1_maxwidth=15 midlayer1_prefwidth=15 midlayer2_minwidth=15 midlayer2_maxwidth=15 midlayer2_prefwidth=15 midlayer3_minwidth=15 midlayer3_maxwidth=15 midlayer3_prefwidth=15 midlayer4_minwidth=15 midlayer4_maxwidth=15 midlayer4_prefwidth=15 bottomlayer_minwidth=15 bottomlayer_maxwidth=15 bottomlayer_prefwidth=15 maxuncoupledlength=500
DiffPairsRouting DiffPairsRouting_4 [InDifferentialPairClass('TYPEC0_IO_Lines')] p5: maxlimit=10 minlimit=10 mostfreqgap=10 toplayer_minwidth=15 toplayer_maxwidth=15 toplayer_prefwidth=15 midlayer1_minwidth=15 midlayer1_maxwidth=15 midlayer1_prefwidth=15 midlayer2_minwidth=15 midlayer2_maxwidth=15 midlayer2_prefwidth=15 midlayer3_minwidth=15 midlayer3_maxwidth=15 midlayer3_prefwidth=15 midlayer4_minwidth=15 midlayer4_maxwidth=15 midlayer4_prefwidth=15 bottomlayer_minwidth=15 bottomlayer_maxwidth=15 bottomlayer_prefwidth=15 maxuncoupledlength=500
DiffPairsRouting DiffPairsRouting_3 [InDifferentialPairClass('HOST1_IO_Lines')] p6: maxlimit=10 minlimit=10 mostfreqgap=10 toplayer_minwidth=15 toplayer_maxwidth=15 toplayer_prefwidth=15 midlayer1_minwidth=15 midlayer1_maxwidth=15 midlayer1_prefwidth=15 midlayer2_minwidth=15 midlayer2_maxwidth=15 midlayer2_prefwidth=15 midlayer3_minwidth=15 midlayer3_maxwidth=15 midlayer3_prefwidth=15 midlayer4_minwidth=15 midlayer4_maxwidth=15 midlayer4_prefwidth=15 bottomlayer_minwidth=15 bottomlayer_maxwidth=15 bottomlayer_prefwidth=15 maxuncoupledlength=500
DiffPairsRouting DiffPairsRouting_2 [InDifferentialPairClass('HDMI_Lines')] p7: maxlimit=10 minlimit=10 mostfreqgap=10 toplayer_minwidth=15 toplayer_maxwidth=15 toplayer_prefwidth=15 midlayer1_minwidth=15 midlayer1_maxwidth=15 midlayer1_prefwidth=15 midlayer2_minwidth=15 midlayer2_maxwidth=15 midlayer2_prefwidth=15 midlayer3_minwidth=15 midlayer3_maxwidth=15 midlayer3_prefwidth=15 midlayer4_minwidth=15 midlayer4_maxwidth=15 midlayer4_prefwidth=15 bottomlayer_minwidth=15 bottomlayer_maxwidth=15 bottomlayer_prefwidth=15 maxuncoupledlength=500
DiffPairsRouting DiffPairsRouting_1 [All] p8: maxlimit=10 minlimit=10 mostfreqgap=10 toplayer_minwidth=15 toplayer_maxwidth=15 toplayer_prefwidth=15 midlayer1_minwidth=15 midlayer1_maxwidth=15 midlayer1_prefwidth=15 midlayer2_minwidth=15 midlayer2_maxwidth=15 midlayer2_prefwidth=15 midlayer3_minwidth=15 midlayer3_maxwidth=15 midlayer3_prefwidth=15 midlayer4_minwidth=15 midlayer4_maxwidth=15 midlayer4_prefwidth=15 bottomlayer_minwidth=15 bottomlayer_maxwidth=15 bottomlayer_prefwidth=15 maxuncoupledlength=500
HoleSize [All] p1: absolutevalues=TRUE maxlimit=1000 minlimit=1 maxpercent=80.000 minpercent=20.000
HoleToHoleClearance [All] p1: gap=0 allowstackedmicrovias=TRUE
MatchedLengths "Schematic Matched Net Lengths_12" [InDifferentialPairClass('TYPEC0_IO_Lines')] p1: tolerance=50 checknetsindiffpair=TRUE checkdiffpairvsdiffpair=FALSE checkxsignals=FALSE checkothers=FALSE
MatchedLengths "Schematic Matched Net Lengths_7" [InNetClass('TYPEC0_TX')] p2: tolerance=50 checknetsindiffpair=TRUE checkdiffpairvsdiffpair=FALSE checkxsignals=FALSE checkothers=FALSE
MatchedLengths "Schematic Matched Net Lengths_2" [InNetClass('TYPEC0_AUX')] p3: tolerance=300 checknetsindiffpair=TRUE checkdiffpairvsdiffpair=FALSE checkxsignals=FALSE checkothers=FALSE
MatchedLengths "Schematic Matched Net Lengths_11" [InNetClass('TYPEC1')] p4: tolerance=50 checknetsindiffpair=TRUE checkdiffpairvsdiffpair=FALSE checkxsignals=FALSE checkothers=FALSE
MatchedLengths "Schematic Matched Net Lengths_9" [InNetClass('HOST1')] p5: tolerance=50 checknetsindiffpair=TRUE checkdiffpairvsdiffpair=FALSE checkxsignals=FALSE checkothers=FALSE
MatchedLengths "Schematic Matched Net Lengths_8" [InNetClass('H1')] p6: tolerance=50 checknetsindiffpair=TRUE checkdiffpairvsdiffpair=FALSE checkxsignals=FALSE checkothers=FALSE
MatchedLengths "Schematic Matched Net Lengths_6" [InNetClass('HDMI_TX2')] p7: tolerance=50 checknetsindiffpair=TRUE checkdiffpairvsdiffpair=FALSE checkxsignals=FALSE checkothers=FALSE
MatchedLengths "Schematic Matched Net Lengths_5" [InNetClass('HDMI_TXC')] p8: tolerance=50 checknetsindiffpair=TRUE checkdiffpairvsdiffpair=FALSE checkxsignals=FALSE checkothers=FALSE
MatchedLengths "Schematic Matched Net Lengths_3" [InNetClass('HDMI_TX1')] p9: tolerance=50 checknetsindiffpair=TRUE checkdiffpairvsdiffpair=FALSE checkxsignals=FALSE checkothers=FALSE
MatchedLengths "Schematic Matched Net Lengths" [InNetClass('HDMI_TX0')] p10: tolerance=50 checknetsindiffpair=TRUE checkdiffpairvsdiffpair=FALSE checkxsignals=FALSE checkothers=FALSE
MatchedLengths "Schematic Matched Net Lengths_1" [InNetClass('USB_A')] p11: tolerance=50 checknetsindiffpair=TRUE checkdiffpairvsdiffpair=FALSE checkxsignals=FALSE checkothers=FALSE
MaxMinImpedance "Schematic Impedance Constraint_12" [InNetClass('TYPEC0_TX')] p1: minimum=85.00 maximum=90.00
MaxMinImpedance "Schematic Impedance Constraint_7" [InDifferentialPairClass('TYPEC0_IO_Lines')] p2: minimum=85.00 maximum=90.00
MaxMinImpedance "Schematic Impedance Constraint_3" [InNetClass('TYPEC0_AUX')] p3: minimum=85.00 maximum=90.00
MaxMinImpedance "Schematic Impedance Constraint_10" [InNetClass('H1')] p4: minimum=85.00 maximum=90.00
MaxMinImpedance "Schematic Impedance Constraint_9" [InNetClass('HOST1')] p5: minimum=85.00 maximum=90.00
MaxMinImpedance "Schematic Impedance Constraint_8" [InNetClass('TYPEC1')] p6: minimum=85.00 maximum=90.00
MaxMinImpedance "Schematic Impedance Constraint_6" [InNetClass('HDMI_TX1')] p7: minimum=85.00 maximum=90.00
MaxMinImpedance "Schematic Impedance Constraint_5" [InNetClass('HDMI_TX0')] p8: minimum=85.00 maximum=90.00
MaxMinImpedance "Schematic Impedance Constraint_2" [InNetClass('HDMI_TX2')] p9: minimum=85.00 maximum=90.00
MaxMinImpedance "Schematic Impedance Constraint" [InNetClass('HDMI_TXC')] p10: minimum=85.00 maximum=90.00
MaxMinImpedance "Schematic Impedance Constraint_1" [InNetClass('USB_A')] p11: minimum=85.00 maximum=95.00
MinimumSolderMaskSliver [All] p1: minsoldermaskwidth=0
PlaneClearance [All] p1: clearance=20
PlaneConnect [All] p1: planeconnectstyle=Direct reliefexpansion=20 reliefentries=4 reliefconductorwidth=10 reliefairgap=10
PolygonConnect [All] p1: connectstyle=Direct reliefconductorwidth=10 reliefentries=4 polygonreliefangle="90 Angle" airgapwidth=10
RoutingVias RoutingVias_1 [All] p1: holewidth=7.87 width=9.84 viastyle="Through Hole" minholewidth=7.87 minwidth=9.84 maxholewidth=11.81 maxwidth=23.62
SilkToSilkClearance [All] p1: silktosilkclearance=0
SilkToSolderMaskClearance [IsPad] p1: minsilkscreentomaskgap=0 clearancetoexposedcopper=TRUE
SolderMaskExpansion [All] p1: expansion=4 istentingtop=FALSE
Width Width_1 [All] p1: maxlimit=40 minlimit=4 preferedwidth=22
21 further rules are at their usual default settings.

## Classes and differential pairs
differential pair class TYPEC0_TX_Lines: TYPEC0TX1 TYPEC0TX2
net class TYPEC0_TX: TYPEC0TX1_N TYPEC0TX1_P TYPEC0TX2_N TYPEC0TX2_P
differential pair class TYPEC0_AUX_Lines: TYPEC0_AUX
net class TYPEC0_AUX: TYPEC0_AUX_N TYPEC0_AUX_P
differential pair class TYPEC1_IO_Lines: TYPEC1 TYPEC1_RX1 TYPEC1_TX1 TYPEC1TX1
differential pair class TYPEC0_IO_Lines: TYPEC0_D TYPEC0_RX1 TYPEC0_RX2 TYPEC0_TX1 TYPEC0_TX2 TYPEC0TX1 TYPEC0TX2
differential pair class HOST1_IO_Lines: HOST1
differential pair class HDMI_Lines: HDMI_OUT.HDMI_TX0 HDMI_OUT.HDMI_TX1 HDMI_OUT.HDMI_TX2 HDMI_OUT.HDMI_TXC
differential pair class H1_Lines: H1
net class H1: H1_N H1_P
net class TYPEC1: TYPEC1_N TYPEC1_P TYPEC1_RX1_N TYPEC1_RX1_P TYPEC1_TX1_N TYPEC1_TX1_P TYPEC1TX1_N TYPEC1TX1_P
net class TYPEC0: TYPEC0_D_N TYPEC0_D_P TYPEC0_RX1_N TYPEC0_RX1_P TYPEC0_RX2_N TYPEC0_RX2_P TYPEC0_TX1_N TYPEC0_TX1_P TYPEC0_TX2_N TYPEC0_TX2_P TYPEC0TX1_N TYPEC0TX1_P TYPEC0TX2_N TYPEC0TX2_P
net class HOST1: HOST1_N HOST1_P
net class HDMI_TXC: HDMI_OUT.HDMI_TXC_N HDMI_OUT.HDMI_TXC_P
net class HDMI_TX2: HDMI_OUT.HDMI_TX2_N HDMI_OUT.HDMI_TX2_P
net class HDMI_TX1: HDMI_OUT.HDMI_TX1_N HDMI_OUT.HDMI_TX1_P
net class HDMI_TX0: HDMI_OUT.HDMI_TX0_N HDMI_OUT.HDMI_TX0_P
component class U_RAM_Sheet: C188 C189 C190 C191 C192 C193 C194 C195 C196 C197 C198 C199 C200 C201 C202 C203 C204 C205 C206 C207 C208 C209 C210 C211 C212 C213 C214 C215 C216 C217 C218 C219 C220 C221 C222 C223 C224 C225 C226 C227 C228 C229 C260 C261 P7 P22 R46 R105 R106 R107 R108 R109 R110 R126 S U15 U18
differential pair class USB_A_Lines: USBA
component class U_USB_Sheet_2: C161 C162 C163 C164 C165 C166 C167 C168 C169 C170 C171 C172 D18 D19 D20 D21 D22 D23 D24 ESD2 J4 R83 R84 R85 R86 R87 R88 R89 SB24 SB25 SB26 SB27 U12 U13
component class U_Power_Sheet_2: C23 C24 C25 C26 C27 C28 C29 C30 D1 D2 D3 D4 D5 P1 P2 P3 P4 P5 Q1 Q2 R20 R21 R22 R23 R24 R25 R26 R27 S SW1 SW2 SW3 SW4 U7 U8
component class U_Power_Sheet_1: C1 C2 C3 C4 C5 C6 C7 C8 C9 C10 C11 C12 C13 C14 C15 C16 C17 C18 C19 C20 C21 C22 L1 L2 L3 L4 L5 R1 R2 R3 R4 R5 R6 R7 R8 R9 R10 R11 R12 R13 R14 R15 R16 R17 R18 R19 s S U1 U2 U3 U4 U5 U6
component class U_PCIe_Sheet: SB19 SB20
component class U_MIPI_Sheet: R60 R61 SB14 SB15
component class U_HDMI_Sheet: C173 C174 D25 D26 D27 D28 F1 J5 Q3 Q4 Q5 R90 R91 R92 R93 R94 R95
component class U_DDRC_Sheet_2: C248 C249 C250 C251 C252 C253 C254 C255 C256 C257 C258 C259 P26 P41 R45 R51
component class U_CameraOrDisplay_Sheet: C142 C143 C144 C145 D8 R52 R53 R54 R55
net class USB_A: USBA_N USBA_P
component class U_GND_Sheet: s U10
component class U_WiFi_Module_Section: ANT1 ANT2 C239 C240 C241 C242 C243 C244 C245 C246 C247 J6 J7 J8 L12 LED1 P39 Q6 R112 R113 R114 R115 S SB29 SB30 SB31 SB32 U17 X5
component class U_USB_Sheet: C152 C153 C154 C155 C156 C157 C158 C159 C160 D15 D16 D17 J2 J3 L10 P34 P35 R73 R74 R75 R76 R77 R78 R79 R80 R81 R82 U11
component class U_SDIO_SDMMC_Sheet: C151 D9 D10 D11 D12 D13 D14 J1 P30 P31 P32 P33 R67 R68 R69 R70 R71 R72 SB21 SB22 SB23
component class U_DDRC_Section: C130 C131 C132 C133 C134 C135 C136 C137 C138 C139 C140 C141 P23 R49 R50 S
component class U_Power_Sheet_3: C31 C32 C33 C34 C35 C36 C37 C38 C39 C40 C41 C42 C43 C44 C45 C46 C47 C48 C49 C50 C51 C52 C53 C54 C55 C56 C57 C58 C59 C60 C61 C62 D6 D7 ESD1 L6 L7 L8 L9 P6 P8 P9 P10 P11 P12 P13 P14 P15 P16 P17 P18 P19 P20 P21 R28 R29 R30 R31 R32 R33 R34 R35 R36 R37 R38 R39 R40 R41 R42 R43 R44 R47 R48 s S SB1 SB2 SB3 SB4 U9 X1
component class U_MISCIO_Sheet: C148 C149 C150 P29 R62 R63 R64 R65 R66 S SB16 SB17 SB18 X2
component class U_Internal_Power_Sheet: C63 C64 C65 C66 C67 C68 C69 C70 C71 C72 C73 C74 C75 C76 C77 C78 C79 C80 C81 C82 C83 C84 C85 C86 C87 C88 C89 C90 C91 C92 C93 C94 C95 C96 C97 C98 C99 C100 C101 C102 C103 C104 C105 C106 C107 C108 C109 C110 C111 C112 C113 C114 C115 C116 C117 C118 C119 C120 C121 C122 C123 C124 C125 C126 C127 C128 C129 s
component class U_Interface_Sheet: P27 P28 R58 R59 S SB5 SB6 SB7 SB8 SB9 SB10 SB11 SB12 SB13
component class U_Flash_Sheet: C230 C231 C232 C233 C234 C235 C236 C237 C238 R111 s S SB28 SW7 U16
component class U_eMMC_Sheet: C146 C147 P24 P25 R56 R57 S SW5
component class U_DSP_Section: C175 C176 C177 C178 C179 C180 C181 C182 C183 C184 C185 C186 C187 L11 P36 P37 P38 R96 R97 R98 R99 R100 R101 R102 R103 R104 S SW6 U14 X3 X4
component class U_Connector_Section: D29 D30 D31 D32 D33 D34 FB1 J9 J10 J11 J12 LED2 LED3 LED4 P40 Q7 Q8 Q9 Q10 R116 R117 R118 R119 R120 R121 R122 R123 R124 R125 S SB33
differential pair TYPEC0_AUX: +TYPEC0_AUX_P -TYPEC0_AUX_N
differential pair USBA: +USBA_P -USBA_N
differential pair TYPEC1TX1: +TYPEC1TX1_P -TYPEC1TX1_N
differential pair TYPEC1: +TYPEC1_P -TYPEC1_N
differential pair TYPEC1_TX1: +TYPEC1_TX1_P -TYPEC1_TX1_N
differential pair TYPEC1_RX1: +TYPEC1_RX1_P -TYPEC1_RX1_N
differential pair TYPEC0TX2: +TYPEC0TX2_P -TYPEC0TX2_N
differential pair TYPEC0TX1: +TYPEC0TX1_P -TYPEC0TX1_N
differential pair TYPEC0_TX2: +TYPEC0_TX2_P -TYPEC0_TX2_N
differential pair TYPEC0_TX1: +TYPEC0_TX1_P -TYPEC0_TX1_N
differential pair TYPEC0_RX2: +TYPEC0_RX2_P -TYPEC0_RX2_N
differential pair TYPEC0_RX1: +TYPEC0_RX1_P -TYPEC0_RX1_N
differential pair TYPEC0_D: +TYPEC0_D_P -TYPEC0_D_N
differential pair HOST1: +HOST1_P -HOST1_N
differential pair HDMI_OUT.HDMI_TXC: +HDMI_OUT.HDMI_TXC_P -HDMI_OUT.HDMI_TXC_N
differential pair HDMI_OUT.HDMI_TX2: +HDMI_OUT.HDMI_TX2_P -HDMI_OUT.HDMI_TX2_N
differential pair HDMI_OUT.HDMI_TX1: +HDMI_OUT.HDMI_TX1_P -HDMI_OUT.HDMI_TX1_N
differential pair HDMI_OUT.HDMI_TX0: +HDMI_OUT.HDMI_TX0_P -HDMI_OUT.HDMI_TX0_N
differential pair H1: +H1_P -H1_N

## Components (designator, comment, footprint, x,y, rotation, side; value= is the part's Value field where it differs from the comment)
ANT1 "RFANT5220110A2T" RFANT5220110A2T 4245.82,1697.82 r90 top locked
ANT2 "RFECA3216060K1T" "ANT 1206" 4256.82,2365.82 r270 top locked
C1 "100pF" Cap0603#1 2502.82,33.82 r270 bottom locked
C2 "22nF" Cap0603#1 2339.5,33.82 r270 bottom locked
C3 "4.7uF" Cap0603#1 2956.82,32.82 r90 bottom locked
C4 "0.1uF" Cap0402 2908.82,46.82 r270 bottom locked
C5 "10uF" Cap0603#1 2490.82,483.32 r0 bottom locked
C6 "0.1uF" Cap0402 2486.82,533.82 r180 bottom locked
C7 "100pF" Cap0603#1 3464.82,-58.18 r0 bottom locked
C8 "0.1uF" "Cap 0402" 3348.82,96.82 r180 bottom locked
C9 "100pF" Cap0603#1 2551.82,428.82 r180 bottom locked
C10 "0.1uF" Cap0402 2684.82,502.32 r90 bottom locked
C11 "10uF" Cap0603#1 3302.82,9.82 r180 bottom locked
C12 "0.1uF" Cap0402 2864.82,-16.68 r270 bottom locked
C13 "22uF" CAP0805 2470.82,560.82 r180 top locked
C14 "10uF" Cap0603#1 2355.18,-59.61 r0 top locked
C15 "0.1uF" Cap0402 2727.82,212.82 r0 bottom locked
C16 "22uF" CAP0805 2732.82,78.82 r270 top locked
C17 "10uF" Cap0603#1 3384.82,203.82 r0 top locked
C18 "0.1uF" Cap0402 3283.82,183.82 r180 top locked
C19 "0.1uF" Cap0402 3480.82,-6.18 r180 bottom
C20 "22nF" Cap0603#1 2861.82,-51.18 r0 top locked
C21 "10uF" Cap0603#1 2787.82,203.82 r0 top locked
C22 "0.1uF" Cap0402 2232.82,53.82 r270 top locked
C23 "1uF" Cap0402 3039.32,640.82 r0 top locked
C24 "0.1uF" Cap0402 4212.82,467.82 r0 top locked
C25 "1uF" Cap0402 3140.82,635.82 r0 top locked
C26 "1nF" Cap0603#1 1138.82,-57.18 r180 bottom locked
C27 "2.2uF" Cap0603#1 4212.82,525.82 r180 top locked
C28 "22nF" Cap0603#1 3165.64,558.82 r270 top locked
C29 "4.7uF" Cap0603#1 3072.82,277.82 r90 bottom locked
C30 "22nF" Cap0603#1 3188.82,187.82 r180 bottom locked
C31 "20pF" Cap0603#1 2100.87,466.83 r270 top locked
C32 "20pF" Cap0603#1 1999.87,466.83 r270 top locked
C33 "10uF" Cap0603#1 1900.82,251.82 r90 bottom locked
C34 "10uF" Cap0603#1 1812.82,276.82 r0 bottom locked
C35 "1uF" Cap0402 1890.82,512.82 r90 bottom locked
C36 "1uF" Cap0402 1850.49,512.82 r90 bottom locked
C37 "1uF" Cap0402 1769.82,512.82 r90 bottom locked
C38 "1uF" Cap0402 1670,614 r90 bottom locked
C39 "1uF" Cap0402 1595,614 r90 bottom locked
C40 "1uF" Cap0402 1632.5,614 r90 bottom locked
C41 "1uF" Cap0402 1647.82,192.82 r0 bottom locked
C42 "1uF" Cap0402 1647.82,230.82 r0 bottom locked
C43 "47pF" Cap0603#1 2180.82,273.82 r180 top locked
C44 "0.1uF" "Cap 0402" 1459,2 r0 bottom locked
C45 "0.1uF" Cap0402 1660.82,140.83 r90 top locked
C46 "0.1uF" "Cap 0402" 1738.82,612.82 r180 bottom locked
C47 "1uF" Cap0402 1609.46,534.61 r90 top locked
C48 "2.2uF" Cap0603#1 1563.82,469.82 r270 bottom locked
C49 "0.1uF" Cap0402 1810.16,512.82 r270 bottom locked
C50 "2.2uF" Cap0603#1 1720.82,526.82 r90 bottom locked
C51 "22uF" CAP0805 1676.87,0.33 r180 bottom locked
C52 "22uF" CAP0805 1676.87,78.33 r180 bottom locked
C53 "22uF" CAP0805 1949.82,445.82 r270 bottom locked
C54 "22uF" CAP0805 1950.82,583.82 r90 bottom locked
C55 "22uF" CAP0805 1502.82,374.82 r180 bottom locked
C56 "22uF" CAP0805 1808.87,420.83 r0 bottom locked
C57 "1uF" Cap0402 1626.32,469.82 r180 bottom locked
C58 "1uF" Cap0402 1626.32,508.82 r180 bottom locked
C59 "22nF" Cap0603#1 1532.82,236.82 r0 top locked
C60 "1uF" Cap0402 1626.32,546.82 r180 bottom locked
C61 "4.7uF" Cap0603#1 1567.82,203.82 r270 bottom locked
C62 "22uF" CAP0805 2059.82,462.82 r90 bottom locked
C63 "10uF" Cap0603#1 1220.82,1393.82 r90 bottom locked
C64 "1nF" Cap0603#1 1273.82,1393.82 r90 bottom locked
C65 "22uF" CAP0805 1154.82,1379.82 r270 bottom locked
C66 "22uF" CAP0805 1074.82,1379.82 r270 bottom locked
C67 "1uF" Cap0402 1190.02,1488.82 r90 bottom locked
C68 "0.1uF" Cap0402 1234.42,1488.82 r90 bottom locked
C69 "0.1uF" Cap0402 1278.82,1488.82 r90 bottom locked
C70 "0.1uF" Cap0402 1056.82,1488.82 r90 bottom locked
C71 "0.1uF" Cap0402 1101.22,1488.82 r90 bottom locked
C72 "0.1uF" Cap0402 1145.62,1488.82 r90 bottom locked
C73 "10uF" Cap0603#1 1944.82,1569.82 r270 bottom locked
C74 "22uF" CAP0805 2320.82,1766.82 r0 bottom locked
C75 "0.1uF" Cap0402 1650,1498 r0 bottom locked
C76 "10uF" Cap0603#1 2305.82,1648.82 r180 bottom locked
C77 "0.1uF" Cap0402 1650,1538 r0 bottom locked
C78 "1uF" Cap0402 1991.82,1564.82 r90 bottom locked
C79 "0.1uF" Cap0402 2286.82,1522.82 r0 bottom locked
C80 "0.1uF" Cap0402 2286.82,1482.82 r0 bottom locked
C81 "0.1uF" Cap0402 2286.82,1602.82 r0 bottom locked
C82 "1uF" Cap0402 2332.82,1919.82 r0 top locked
C83 "0.1uF" Cap0402 2286.82,1562.82 r0 bottom locked
C84 "0.1uF" Cap0402 2332.82,1880.51 r0 top locked
C85 "1nF" Cap0603#1 2305.82,1701.82 r180 bottom locked
C86 "0.1uF" Cap0402 2332.82,1841.2 r0 top locked
C87 "0.1uF" Cap0402 2332.82,1801.88 r0 top locked
C88 "0.1uF" Cap0402 2332.82,1762.57 r0 top locked
C89 "0.1uF" Cap0402 2332.82,1723.26 r0 top locked
C90 "0.1uF" Cap0402 2332.82,1683.95 r0 top locked
C91 "0.1uF" Cap0402 2332.82,1644.63 r0 top locked
C92 "10uF" Cap0603#1 2455.82,1911.82 r180 top locked
C93 "22uF" CAP0805 2457.82,1791.22 r0 top locked
C94 "22uF" CAP0805 2457.82,1710.78 r0 top locked
C95 "22uF" CAP0805 2457.82,1630.34 r0 top locked
C96 "1uF" Cap0402 2332.82,1486.26 r180 top locked
C97 "10uF" Cap0603#1 2332.82,975.82 r0 top locked
C98 "0.1uF" Cap0402 2332.82,1446.95 r180 top locked
C99 "22uF" CAP0805 2457.82,1308.58 r0 top locked
C100 "0.1uF" Cap0402 2332.82,1407.63 r180 top locked
C101 "22uF" CAP0805 2457.82,1389.02 r0 top locked
C102 "0.1uF" Cap0402 2332.82,1368.32 r180 top locked
C103 "22uF" CAP0805 2457.82,1469.46 r0 top locked
C104 "0.1uF" Cap0402 2332.82,1603.82 r180 top locked
C105 "1uF" Cap0402 2332.82,1210.02 r180 top locked
C106 "0.1uF" Cap0402 2332.82,1564.51 r180 top locked
C107 "0.1uF" Cap0402 2332.82,1249.62 r180 top locked
C108 "0.1uF" Cap0402 2332.82,1525.82 r180 top locked
C109 "0.1uF" Cap0402 2332.82,1289.22 r180 top locked
C110 "1nF" Cap0603#1 2455.82,1857.82 r180 top locked
C111 "0.1uF" Cap0402 2332.82,1328.82 r180 top locked
C112 "0.1uF" "Cap 0402" 2332.82,1090.82 r180 top locked
C113 "0.1uF" Cap0402 2332.82,1130.82 r180 top locked
C114 "0.1uF" Cap0402 2332.82,1170.42 r180 top locked
C115 "1nF" Cap0603#1 2332.82,1029.82 r0 top locked
C116 "22uF" CAP0805 2457.82,1228.14 r0 top locked
C117 "22uF" CAP0805 2457.82,1147.7 r0 top locked
C118 "10uF" Cap0603#1 1190.2,1704.82 r270 bottom locked
C119 "22uF" CAP0805 2457.82,1549.9 r0 top locked
C120 "22uF" CAP0805 1278.82,1689.82 r90 bottom locked
C121 "22uF" CAP0805 2457.82,986.82 r0 top locked
C122 "10uF" Cap0603#1 1130.01,1704.82 r270 bottom locked
C123 "22uF" CAP0805 2457.82,1067.26 r0 top locked
C124 "1uF" Cap0402 1041.82,1616.82 r270 bottom locked
C125 "0.1uF" Cap0402 1197.72,1616.82 r270 bottom locked
C126 "0.1uF" Cap0402 1080.8,1616.82 r270 bottom locked
C127 "0.1uF" Cap0402 1158.75,1616.82 r270 bottom locked
C128 "0.1uF" Cap0402 1119.77,1616.82 r270 bottom locked
C129 "1nF" Cap0603#1 1069.82,1704.82 r270 bottom locked
C130 "0.1uF" Cap0402 1845.82,1374.32 r270 bottom locked
C131 "0.1uF" Cap0402 1969.38,1173.82 r270 bottom locked
C132 "0.1uF" Cap0402 1931.49,1173.82 r270 bottom locked
C133 "0.1uF" Cap0402 1882.6,1173.82 r270 bottom locked
C134 "0.1uF" Cap0402 2007.27,1173.82 r270 bottom locked
C135 "0.1uF" Cap0402 2045.16,1173.82 r270 bottom locked
C136 "0.1uF" Cap0402 2158.82,1173.82 r270 bottom locked
C137 "0.1uF" Cap0402 2120.93,1173.82 r270 bottom locked
C138 "0.1uF" Cap0402 2083.04,1173.82 r270 bottom locked
C139 "0.1uF" Cap0402 1844.71,1173.82 r270 bottom locked
C140 "0.1uF" Cap0402 1806.82,1173.82 r270 bottom locked
C141 "0.1uF" Cap0402 2052,1385 r0 bottom locked
C142 "4.7uF" Cap0603#1 1949.82,1829.82 r270 bottom locked
C143 "0.1uF" Cap0402 1863.82,1748.82 r270 bottom locked
C144 "4.7uF" Cap0603#1 1766.82,1826.82 r0 bottom locked
C145 "0.1uF" Cap0402 1860.32,1833.82 r0 bottom locked
C146 "0.1uF" Cap0402 1619.82,1420.82 r270 bottom locked
C147 "0.1uF" Cap0402 1539.5,1518 r180 bottom
C148 "20pF" Cap0603#1 1456.14,1696.82 r0 bottom locked
C149 "20pF" Cap0603#1 1452.14,1926.82 r180 bottom locked
C150 "0.1uF" Cap0402 1475.14,1648.82 r0 bottom locked
C151 "0.1uF" Cap0402 1558,1668.5 r270 bottom locked
C152 "0.1uF" Cap0402 1804.82,1728.82 r0 bottom locked
C153 "0.1uF" Cap0402 1690,1772 r180 bottom locked
C154 "0.1uF" Cap0402 1236.82,1795.82 r90 bottom locked
C155 "0.1uF" Cap0402 1659,1710 r90 bottom locked
C156 "0.1uF" Cap0402 1651.5,1641 r0 bottom locked
C157 "0.1uF" Cap0402 276,2894 r0 bottom locked
C158 "0.1uF" Cap0402 1616,3150 r90 bottom locked
C159 "0.1uF" Cap0402 1390.82,2900.82 r90 top locked
C160 "0.1uF" Cap0402 1468.82,2900.82 r90 top locked
C161 "1uF" Cap0402 622.82,3078.82 r0 bottom locked
C162 "1uF" Cap0402 622.82,3020.82 r0 bottom locked
C163 "1uF" Cap0402 31,2942 r180 bottom locked
C164 "10uF" Cap0603#1 169,2946 r180 bottom locked
C165 "10uF" Cap0603#1 28,2894 r0 bottom locked
C166 "0.1uF" Cap0402 509.82,3067.82 r180 bottom locked
C167 "0.1uF" Cap0402 669.82,3257.82 r0 bottom locked
C168 "0.1uF" Cap0402 865.82,3257.82 r180 bottom locked
C169 "0.1uF" Cap0402 848.82,3240.82 r90 top locked
C170 "0.1uF" Cap0402 888.82,3240.82 r90 top locked
C171 "0.1uF" Cap0402 644.82,3240.82 r90 top locked
C172 "0.1uF" Cap0402 685,3240.82 r90 top locked
C173 "0.1uF" Cap0402 2119.82,3012.82 r270 top locked
C174 "1uF" Cap0402 2169.82,3022.82 r270 bottom locked
C175 "0.1uF" Cap0402 3473.32,2976.82 r180 bottom locked
C176 "0.1uF" Cap0402 3296.82,2938.82 r270 bottom locked
C177 "0.1uF" Cap0402 3554.82,2788.82 r90 bottom locked
C178 "0.1uF" Cap0402 3472.82,3014.82 r180 bottom locked
C179 "1uF" Cap0402 3510.82,2788.82 r90 bottom locked
C180 "2.2uF" Cap0603#1 3453.82,2792.82 r270 bottom locked
C181 "0.1uF" Cap0402 3272.82,2785.82 r180 bottom locked
C182 "1uF" Cap0402 3592.82,3104.82 r0 top locked
C183 "0.1uF" Cap0402 4226.82,3234.82 r0 bottom locked
C184 "27pF" Cap0603#2 3048.82,2956.82 r0 top locked
C185 "27pF" Cap0603#2 2897.82,2853.82 r270 top locked
C186 "20pF" Cap0603#1 3327.82,3080.82 r0 top locked
C187 "20pF" Cap0603#1 3071.82,3079.82 r180 top locked
C188 "22uF" Cap0603#2 479.87,529.98 r180 bottom locked
C189 "1uF" Cap0402 569.94,454.76 r0 bottom
C190 "100nF" Cap0402 569.94,415.98 r0 bottom
C191 "100nF" Cap0402 517,345 r0 bottom locked
C192 "100nF" Cap0402 517,307 r0 bottom locked
C193 "100nF" Cap0402 898,427 r180 bottom locked
C194 "100nF" Cap0402 901,347 r0 bottom locked
C195 "100nF" Cap0402 622,344 r180 bottom locked
C196 "10uF" Cap0603#2 861,568 r0 bottom locked
C197 "100nF" Cap0402 770,399 r180 bottom locked
C198 "100nF" Cap0402 831,115 r270 bottom locked
C199 "100nF" Cap0402 872,503 r0 bottom locked
C200 "10uF" Cap0603#2 621,555 r180 top locked
C201 "1uF" Cap0402 690,501 r0 bottom locked
C202 "100nF" Cap0402 1012,414 r0 bottom locked
C203 "100nF" Cap0402 990,261 r90 bottom locked
C204 "100nF" Cap0402 850,307 r0 bottom locked
C205 "100nF" Cap0402 394,230 r270 bottom locked
C206 "100nF" Cap0402 582,128 r180 bottom locked
C207 "100nF" Cap0402 697,173 r90 bottom locked
C208 "22uF" Cap0603#2 1009,743 r270 bottom locked
C209 "1uF" Cap0402 864.04,691.77 r180 bottom locked
C210 "100nF" Cap0402 895,814 r0 bottom locked
C211 "100nF" Cap0402 895,852 r0 bottom locked
C212 "100nF" Cap0402 907,890 r0 bottom locked
C213 "100nF" Cap0402 839,890 r180 bottom locked
C214 "100nF" Cap0402 885,1043 r0 bottom locked
C215 "100nF" Cap0402 848.95,990 r0 bottom locked
C216 "10uF" Cap0603#2 519,644 r180 bottom locked
C217 "100nF" Cap0402 613,801 r0 bottom locked
C218 "100nF" Cap0402 537,940 r180 bottom locked
C219 "100nF" Cap0402 787,665 r180 bottom locked
C220 "10uF" Cap0603#2 366,932 r270 bottom locked
C221 "1uF" Cap0402 569,852 r0 bottom locked
C222 "100nF" Cap0402 715,962 r270 bottom locked
C223 "100nF" Cap0402 753,888 r180 bottom
C224 "100nF" Cap0402 770,1050 r0 bottom locked
C225 "100nF" Cap0402 569,890 r0 bottom locked
C226 "100nF" Cap0402 588,1042 r180 bottom locked
C227 "100nF" Cap0402 634,665 r180 bottom locked
C228 "100nF" Cap0402 677,962 r270 bottom locked
C229 "100nF" Cap0402 391,773 r270 bottom locked
C230 "1uF" Cap0402 759.82,1543.82 r0 bottom locked
C231 "4.7uF" "Cap 0402" 669.82,1371.82 r180 bottom locked
C232 "0.1uF" "Cap 0402" 669.82,1409.82 r180 bottom locked
C233 "0.1uF" "Cap 0402" 804.82,1470.82 r90 bottom locked
C234 "0.1uF" "Cap 0402" 765.82,1470.82 r90 bottom locked
C235 "4.7uF" "Cap 0402" 554.82,1455.82 r180 bottom locked
C236 "0.1uF" "Cap 0402" 554.82,1515.82 r180 bottom locked
C237 "0.1uF" "Cap 0402" 649.82,1529.32 r90 bottom locked
C238 "0.1uF" "Cap 0402" 609.82,1529.32 r90 bottom locked
C239 "10pF" Cap0603#1 3963.82,1477.82 r0 top locked
C240 "10pF" Cap0603#1 3967.82,2569.82 r0 top locked
C241 "4.7uF" Cap0603#1 3194.82,2034.82 r180 bottom locked
C242 "0.1uF" Cap0402 3194.82,1988.82 r0 bottom locked
C243 "10pF" Cap0603#1 3522.82,2496.82 r0 top locked
C244 "10pF" Cap0603#1 3604.82,2417.82 r90 top locked
C245 "4.7uF" Cap0603#1 3295.82,2471.82 r180 top locked
C246 "22uF" CAP0805 3194.82,1930.82 r0 bottom locked
C247 "0.1uF" Cap0402 3194.82,1871.82 r0 bottom locked
C248 "0.1uF" Cap0402 1884,1374 r270 bottom locked
C249 "0.1uF" Cap0402 1855.87,1073.5 r90 bottom locked
C250 "0.1uF" Cap0402 2089.12,1073.5 r90 bottom locked
C251 "0.1uF" Cap0402 1817,1073.5 r90 bottom locked
C252 "0.1uF" Cap0402 2128,1073.5 r90 bottom locked
C253 "0.1uF" Cap0402 2050.25,1073.5 r90 bottom locked
C254 "0.1uF" Cap0402 2011.37,1073.5 r90 bottom locked
C255 "0.1uF" Cap0402 1972.5,1073.5 r90 bottom locked
C256 "0.1uF" Cap0402 356,230 r270 bottom locked
C257 "0.1uF" Cap0402 1933.62,1073.5 r90 bottom locked
C258 "0.1uF" Cap0402 1894.75,1073.5 r90 bottom locked
C259 "0.1uF" Cap0402 2097,1474.5 r90 bottom locked
C260 "100nF" Cap0402 679,741 r270 bottom locked
C261 "100nF" Cap0402 995,962 r90 bottom locked
D1 "B5819WS" SOD-323#1 1392.82,-56.18 r0 bottom locked
D2 "ESD5451N-2/TR" DFN1006-2L 1472.82,56.82 r180 bottom locked
D3 "B5819WS" SOD-323#1 4189.82,586.82 r180 top locked
D4 "ESD5451N-2/TR" DFN1006-2L 1157.82,2.82 r0 bottom locked
D5 "ESD5451N-2/TR" DFN1006-2L 1597.82,-66.18 r180 bottom locked
D6 "B5819WS" SOD-323#2 1845,341.82 r0 bottom locked
D7 "B5819WS" SOD-323#1 1480.72,181.82 r0 bottom locked
D8 "BZT52C3V3-E3-08" SOD-123 1865,1996 r270 bottom locked
D9 "ESD9X5VU" DFN1006-2L 4234.82,3031.82 r0 top locked
D10 "ESD9X5VU" DFN1006-2L 4234.82,2837.32 r0 top locked
D11 "ESD9X5VU" DFN1006-2L 4234.82,2988.82 r0 top locked
D12 "ESD9X5VU" DFN1006-2L 4234.82,2880.82 r0 top locked
D13 "ESD9X5VU" DFN1006-2L 4234.82,2793.82 r0 top locked
D14 "ESD9X5VU" DFN1006-2L 4234.82,2945.82 r0 top locked
D15 "B5819WS" SOD-323#1 1508.1,3271 r180 bottom locked
D16 "ESD5344D-10/TR" DFN2510-10L 1218.14,2976.07 r90 bottom locked
D17 "ESD5344D-10/TR" DFN2510-10L 1345.14,2976.07 r90 bottom locked
D18 "ESD5344D-10/TR" DFN2510-10L 775.31,3347.75 r90 bottom locked
D19 "ESD5344D-10/TR" DFN2510-10L 882.31,3347.75 r90 bottom locked
D20 "ESD5344D-10/TR" DFN2510-10L 668.31,3347.75 r90 bottom locked
D21 "B5819WS" SOD-323#1 169,2764 r0 bottom locked
D22 "BZT52C3V3-E3-08" SOD-123 587.82,2956.82 r180 bottom locked
D23 "ESD9X5VU" DFN1006-2L 683.82,3195.82 r90 bottom locked
D24 "ESD9X5VU" DFN1006-2L 628.82,3195.82 r90 bottom locked
D25 "TPD4E05U06DQAR" uSON-10 2117.31,3223 r270 bottom locked
D26 "ESD5451N-2/TR" DFN1006-2L 2219.82,3007.57 r270 top locked
D27 "TPD4E05U06DQAR" uSON-10 1880.31,3223 r270 bottom locked
D28 "TPD4E05U06DQAR" uSON-10 1998.31,3223 r270 bottom locked
D29 "BAT54CW" SOT-323 3778.13,1112.23 r270 top locked
D30 "B5819WS" SOD-323#1 3956.82,731.72 r270 bottom locked
D31 "BZT52C3V3-E3-08" SOD-123 4077.82,1026.82 r180 bottom locked
D32 "ESD5451N-2/TR" DFN1006-2L 4122.82,1241.82 r180 bottom locked
D33 "ESD5451N-2/TR" DFN1006-2L 4124.84,1157.82 r180 bottom locked
D34 "B5819WS" SOD-323#1 4104.82,1298.82 r180 bottom locked
ESD1 "AZ5825-01F" DFN1006-2L 1948.82,254.55 r270 bottom locked
ESD2 "AZ5825-01F" DFN1006-2L 510.82,3068.82 r180 top locked
F1 "SMD0603-050" "Fuse 0603" 2165.82,3012.82 r90 top locked
FB1 "MPZ1608S121ATDH5" MPZ1608S121ATDH5 4023.82,843.82 r270 top locked
J1 "5033981892" 503398-1892 3980.96,2887.28 r90 bottom locked
J2 "61400416021" 61400416021 400.52,2855.16 r270 top locked
J3 "U231-091N-4BLRA00-S" U231-091N-4BLRA00-S 1311.82,3103.82 r180 top locked
J4 "2305018-2" 2305018-2 775.82,3390.82 r180 top locked
J5 "10029449-111RLF" 10029449-111RLF 2007.82,3247.82 r180 top locked
J6 "U.FL-R-SMT-1(80)" U.FL-R-SMT-1(80) 4230.82,1476.82 r90 top locked
J7 "U.FL-R-SMT-1(80)" U.FL-R-SMT-1(80) 4230.82,2569.82 r90 top locked
J8 "PZ254R-11-07P" HDR1X7H 3966.82,3350.82 r180 top locked
J9 "0473460001" 0473460001 295.55,3389.82 r180 top locked
J10 "DC-C024E-7A-1.65" DC-C024E-7A-1.65 3847.16,279.47 r90 top locked
J11 "CR1220-2" CR1220-2 3476.09,1135.82 r180 bottom locked value=Cuctom
J12 "B2B-XH-A(LF)(SN)" B2B-XH-A(LF)(SN) 4186.82,777.82 r270 top locked
L1 "240nH" FNR5040SR24NT 3524.82,365.66 r270 top locked
L2 "240nH" FNR5040SR24NT 2929.82,365.66 r270 top locked
L3 "2.2uH" YSPI0520-2R2M 3095.82,51.82 r180 top locked
L4 "3.3uH" MWPY4020-3R3M-T 2518.82,185.82 r180 top locked
L5 "3.3uH" MWPY4020-3R3M-T 2626.82,679.82 r0 top locked
L6 "1uH" PSPMAA0412-1R0M-ANP 1831.82,-13.18 r180 top locked
L7 "1uH" PSPMAA0412-1R0M-ANP 1502.87,425.71 r270 top locked
L8 "2.2uH" MHP0302-2R2M 2012.82,296.67 r90 top locked
L9 "2.2uH" MHP0302-2R2M 2312.82,446.82 r270 top locked
L10 "SDCW2012-2-900TF" SDCW2012-2-900TF 507,2852 r180 top locked
L11 "BLM15AG601SN1D" "IND 0402" 3562.82,2990.82 r270 top locked
L12 "4.7uH" SWPA4030S4R7MT 3154.82,2447.82 r180 top locked
LED1 "Blue" "LED 0402" 3597.82,776.82 r0 top locked
LED2 "Green" "LED 0402" 3597.82,630.82 r0 top locked
LED3 "Red" "LED 0402" 3597.82,703.82 r0 top locked
LED4 "Yellow" "LED 0402" 3597.82,557.82 r0 top locked
P1 "TEST POINT" "TEST POINT" 576.82,2537.82 r90 top locked
P2 "TEST POINT" "TEST POINT" 3550.82,1290.91 r90 top locked
P3 "TEST POINT" "TEST POINT" 3031.42,826.82 r90 top locked
P4 "TEST POINT" "TEST POINT" 3551.82,1378.37 r90 top locked
P5 "TEST POINT" "TEST POINT" 2944.22,826.82 r90 top locked
P6 "TEST POINT" "TEST POINT" 2857.02,826.82 r90 top locked
P7 "TEST POINT" "TEST POINT" 756,71 r0 top locked
P8 "TEST POINT" "TEST POINT" 575.82,2109.42 r270 top locked
P9 "TEST POINT" "TEST POINT" 575.82,2195.02 r270 top locked
P10 "61300211121" HDR1X2 316.82,-40.18 r180 top locked
P11 "TEST POINT" "TEST POINT" 575.82,2451.82 r0 top locked
P12 "TEST POINT" "TEST POINT" 3118.62,826.82 r90 top locked
P13 "TEST POINT" "TEST POINT" 575.82,2023.82 r270 top locked
P14 "TEST POINT" "TEST POINT" 3553.82,1731.82 r90 top locked
P15 "TEST POINT" "TEST POINT" 3205.82,826.82 r0 top locked
P16 "61300211121" HDR1X2 556.82,-40.18 r180 top locked
P17 "Test Point" "TEST POINT" 3551.82,1467.09 r0 top locked
P18 "Test Point" "TEST POINT" 576.82,1851.82 r0 top locked
P19 "Test Point" "TEST POINT" 576.82,1766.82 r0 top locked
P20 "Test Point" "TEST POINT" 3552.82,1643.82 r0 top locked
P21 "Test Point" "TEST POINT" 3551.82,1555.82 r0 top locked
P22 "TEST POINT" "TEST POINT" 77,612 r0 top locked
P23 "Test Point" "TEST POINT" 2769.82,826.82 r90 top locked
P24 "Test Point" "TEST POINT" 77.82,525.82 r0 top locked
P25 "TEST POINT" "TEST POINT" 77.82,440.82 r0 top locked
P26 "TEST POINT" "TEST POINT" 2682,826.82 r0 top locked
P27 "61300611121" HDR1X6 -42.18,1845.82 r270 top locked
P28 "61300211121" HDR1X2 -42.18,828.57 r90 top locked
P29 "61300211121" HDR1X2 -42.18,2006.07 r90 top locked
P30 "61300211121" HDR1X2 -42.18,2279.82 r90 top locked
P31 "61300211121" HDR1X2 -42.18,1085.45 r90 top locked
P32 "Test Point" "TEST POINT" 3550.82,1202.19 r90 top locked
P33 "TEST POINT" "TEST POINT" 576.82,1937.82 r90 top locked
P34 "TEST POINT" "TEST POINT" 575.82,2366.22 r0 top locked
P35 "TEST POINT" "TEST POINT" 575.82,2280.62 r0 top locked
P36 "61300211121" HDR1X2 3003.82,3450.82 r180 top locked
P37 "61300211121" HDR1X2 2773.82,3450.82 r180 top locked
P38 "61300211121" HDR1X2 2443.82,3450.82 r0 top locked
P39 "61300211121" HDR1X2 3133.82,3450.82 r0 top locked
P40 "61300311121" HDR1X3 4234.82,1241.82 r270 top locked
P41 "TEST POINT" "TEST POINT" 2523,2257 r0 top locked
Q1 "AO3401" SOT23-3 4203.43,305.82 r0 bottom locked
Q2 "S8050" SOT23-3 4203.43,448.5 r0 bottom locked
Q3 "WNM6001-3/TR" SOT23-3 2066.82,3021.82 r180 bottom locked
Q4 "WNM6001-3/TR" SOT23-3 2362.82,3021.82 r180 bottom locked
Q5 "WNM6001-3/TR" SOT23-3 1868.82,3021.82 r180 bottom locked
Q6 "S8050" SOT23-3 3490.22,701.82 r180 bottom locked
Q7 "SI2302-TP" SI2302-TP 3818.82,750.82 r270 bottom locked
Q8 "S8050" SOT23-3 3194.82,701.82 r180 bottom locked
Q9 "S8050" SOT23-3 3490.22,507.82 r180 bottom locked
Q10 "S8050" SOT23-3 3194.82,507.82 r180 bottom locked
R1 "10K" RES0603 2159.82,83.82 r0 top locked
R2 "100R" RES0603 2502.18,34.39 r270 top locked
R3 "100K" RES0603 2447.18,34.39 r90 top locked
R4 "200K" RES0603 2449.38,33.82 r90 bottom locked
R5 "118K" RES0603 2394.94,33.82 r90 bottom locked
R6 "12K" RES0603 2286.06,33.82 r90 bottom locked
R7 "18K" RES0603 2231.62,33.82 r90 bottom locked
R8 "30K" RES0603 2177.18,33.82 r90 bottom locked
R9 "10K" RES0603 3270.82,232.82 r0 top locked
R10 "100R" RES0603 3289.82,341.82 r0 top locked
R11 "100R" RES0603 2675.82,297.82 r0 top locked
R12 "10K" RES0603 2676.82,221.82 r0 top locked
R13 "10K" RES0603 3463.82,51.82 r180 top locked
R14 "33.2K" RES0603 3463.82,-58.18 r180 top locked
R15 "10K" RES0603 3463.82,-3.18 r180 top locked
R16 "33K" RES0603 2772.82,481.82 r180 top locked
R17 "100K" RES0603 2479.82,434.82 r0 top locked
R18 "200K" RES0603 2479.82,489.82 r0 top locked
R19 "10K" RES0603 2816.82,30.82 r270 bottom locked
R20 "0R" RES0603 1362.82,2.82 r180 bottom locked
R21 "10K" RES0603 1274.82,-28.18 r270 bottom locked
R22 "4.7K" RES0603 4212.82,417.82 r0 top locked
R23 "10R" RES0603 1219.82,-28.18 r90 bottom locked
R24 "10K" RES0603 4210.82,599.82 r180 bottom locked
R25 "47K" RES0603 4210.82,543.82 r180 bottom locked
R26 "100K" RES0603 2953.82,549.82 r270 top locked
R27 "10K" RES0603 3287.82,270.82 r270 bottom locked
R28 "150K" RES0603 1705.82,319.82 r270 bottom locked
R29 "270K" RES0603 1624.82,350.82 r180 bottom locked
R30 "100R" RES0603 1706.87,121.83 r270 top locked
R31 "100R" RES0603 1427.82,297.82 r180 top locked
R32 "10K" RES0603 2190.82,541.82 r0 top locked
R33 "20K" RES0603 2180.82,328.82 r0 top locked
R34 "200K" RES0603 2241.82,217.82 r0 top locked
R35 "1K" RES0603 2041.87,115.33 r0 top locked
R36 "1K" RES0603 2041.87,172.33 r0 top locked
R37 "100R" RES0603 2179.82,329.82 r0 bottom locked
R38 "1K" RES0603 1849.82,611.82 r0 bottom locked
R39 "10K" RES0603 1855.82,164.82 r0 top locked
R40 "10K" RES0603 1800.82,78.82 r180 bottom locked
R41 "4.7K" RES0603 1510.32,469.82 r270 bottom locked
R42 "10K" RES0603 2192.82,439.82 r0 bottom locked
R43 "4.7K" RES0603 1454.82,469.82 r270 bottom locked
R44 "10K" RES0603 1927.82,547.82 r270 top locked
R45 "0R" Res0603 2054,1456 r270 bottom locked
R46 "240R" Res0402 440,307 r180 bottom locked
R47 "2M" RES0603 1532.82,182.82 r180 top locked
R48 "10K" RES0603 1664.82,145.82 r0 bottom locked
R49 "0R" RES0603 2200.82,1154.82 r90 bottom locked
R50 "240R" RES0603 1803,1392 r90 bottom locked
R51 "240R" RES0603 2068.82,1640.82 r180 bottom locked
R52 "1.62K" RES0603 1928.55,1937 r270 bottom locked
R53 "1K" RES0603 1799,1908 r270 bottom locked
R54 "4.7K" RES0603 1458.82,1362.82 r90 bottom locked
R55 "4.7K" RES0603 1514.82,1362.82 r90 bottom locked
R56 "10K" RES0603 1269.82,1540.82 r0 top locked
R57 "22R" RES0603 1269.82,1434.82 r180 top locked
R58 "10K" RES0603 1616,1865 r90 bottom locked
R59 "10K" RES0603 1667,1947 r180 bottom locked
R60 "4.02K" RES0603 2067.56,2108.82 r90 top locked
R61 "4.02K" RES0603 2122.62,2108.82 r90 top locked
R62 "0R" RES0603 1385.82,1641.82 r0 bottom locked
R63 "22R" RES0603 1356.14,1937.82 r90 bottom locked
R64 "1M" RES0603 1356.14,1829.82 r90 bottom locked
R65 "1K" RES0603 1698.82,1880.82 r180 bottom locked
R66 "10K" RES0603 1244.82,1914.82 r270 bottom locked
R67 "33R" RES0603 58.82,2278.82 r0 bottom locked
R68 "33R" RES0603 1525.37,2108.82 r270 top locked
R69 "0R" RES0603 58.82,2379.82 r180 bottom locked
R70 "33R" RES0603 1580.14,2108.82 r270 top locked
R71 "33R" RES0603 1415.82,2108.82 r270 top locked
R72 "33R" RES0603 1470.59,2108.82 r270 top locked
R73 "1R" RES0603 1269.82,1769.82 r180 top locked
R74 "1R" RES0603 1269.82,1709.02 r180 top locked
R75 "133R" RES0603 1288.82,2060.51 r0 top locked
R76 "133R" RES0603 1288.82,2116.82 r180 top locked
R77 "499R" RES0603 1689.68,2108.82 r270 top locked
R78 "499R" RES0603 1634.91,2108.82 r270 top locked
R79 "1K" RES0603 1411,3303 r270 bottom locked
R80 "47K" RES0603 1515,3334 r0 bottom locked
R81 "499R" RES0603 1799.22,2108.82 r90 top locked
R82 "499R" RES0603 1744.45,2108.82 r90 top locked
R83 "1K" RES0603 168,2707 r0 bottom locked
R84 "47K" RES0603 28,2820 r0 bottom locked
R85 "1K" RES0603 527.82,2991.82 r270 top locked
R86 "100K" RES0603 733.82,3224.82 r270 top locked
R87 "100K" RES0603 799.82,3224.82 r270 top locked
R88 "2M" RES0603 736.82,3224.82 r270 bottom locked
R89 "2M" RES0603 800.82,3223.82 r270 bottom locked
R90 "4.7K" RES0603 2066.82,2927.82 r180 bottom locked
R91 "4.7K" RES0603 1973.82,3012.82 r270 bottom locked
R92 "4.7K" RES0603 2363.82,2927.82 r180 bottom locked
R93 "1.5K" RES0603 2267.82,3012.82 r270 bottom locked
R94 "4.7K" RES0603 1867.82,2927.82 r180 bottom locked
R95 "1.5K" RES0603 1773.82,3012.82 r270 bottom locked
R96 "10K" RES0603 3256.82,2609.82 r0 top locked
R97 "10K" RES0603 3284.82,2664.82 r0 top locked
R98 "10K" RES0603 3326.82,3001.82 r180 bottom locked
R99 "10K" RES0603 3371.82,2766.82 r180 bottom locked
R100 "220R" RES0603 3267.82,2833.82 r180 bottom locked
R101 "10K" RES0603 2894.82,3357.82 r90 bottom locked
R102 "10K" RES0603 2674.82,3357.82 r90 bottom locked
R103 "47R" RES0603 3592.82,3055.82 r0 top locked
R104 "10K" RES0603 4100.82,3235.82 r0 top locked
R105 "0R" RES0603 519,644 r0 top locked
R106 "240R" Res0402 440,345 r0 bottom locked
R107 "240R" Res0402 365,842 r270 top locked
R108 "0R" RES0603 366,933 r270 top locked
R109 "240R" Res0402 422,870 r270 bottom locked
R110 "10K" Res0402 568,186 r0 bottom locked
R111 "10K" RES0603 68.82,287.82 r90 bottom locked
R112 "22R" RES0603 3688.82,2323.82 r180 bottom locked
R113 "10K" RES0603 3295.82,2415.82 r180 top locked
R114 "220R" RES0603 3479.22,798.82 r180 bottom locked
R115 "4.7K" RES0603 3593.82,689.82 r270 bottom locked
R116 "100R" RES0603 4111.82,1103.82 r0 bottom locked
R117 "10K" RES0603 3947.82,875.82 r270 bottom locked
R118 "10K" RES0603 3987.82,1297.82 r180 bottom locked
R119 "100K" RES0603 3865.82,845.82 r180 bottom locked
R120 "100R" RES0603 3183.82,798.82 r180 bottom locked
R121 "100R" RES0603 3479.22,601.82 r0 bottom locked
R122 "100R" RES0603 3183.82,601.82 r180 bottom locked
R123 "10K" RES0603 3300.82,686.82 r270 bottom locked
R124 "10K" RES0603 3592.82,498.82 r270 bottom locked
R125 "10K" RES0603 3303.82,494.82 r270 bottom locked
R126 "10K" Res0402 786.5,728 r0 bottom locked
SB1 "Solder Bridge" "Solder Bridge" 1923.82,106.82 r0 top locked
SB2 "Solder Bridge" "Solder Bridge" 1388.87,465.83 r90 top locked
SB3 "Solder Bridge" "Solder Bridge" 2100.82,303.82 r270 top locked
SB4 "Solder Bridge" "Solder Bridge" 2192.82,487.82 r0 top locked
SB5 "Solder Bridge" "Solder Bridge" 1269.82,1278.82 r0 top locked
SB6 "Solder Bridge" "Solder Bridge" 1269.82,1381.82 r0 top locked
SB7 "Solder Bridge" "Solder Bridge" 1269.82,1330.82 r0 top locked
SB8 "Solder Bridge" "Solder Bridge" 1269.82,1649.82 r0 top locked
SB9 "Solder Bridge" "Solder Bridge" 1269.82,1595.82 r0 top locked
SB10 "Solder Bridge" "Solder Bridge" 1906.69,2108.82 r270 top locked
SB11 "Solder Bridge" "Solder Bridge" 2281.26,2108.82 r270 top locked
SB12 "Solder Bridge" "Solder Bridge" 2228.47,2108.82 r270 top locked
SB13 "Solder Bridge" "Solder Bridge" 2175.69,2108.82 r270 top locked
SB14 "Solder Bridge" "Solder Bridge" 1960.09,2108.82 r90 top locked
SB15 "Solder Bridge" "Solder Bridge" 2013.49,2108.82 r90 top locked
SB16 "Solder Bridge" "Solder Bridge" 1269.82,1823.82 r180 top locked
SB17 "Solder Bridge" "Solder Bridge" 1269.82,1487.82 r180 top locked
SB18 "Solder Bridge" "Solder Bridge" 1269.82,1874.82 r180 top locked
SB19 "Solder Bridge" "Solder Bridge" 1269.82,1925.82 r180 top locked
SB20 "Solder Bridge" "Solder Bridge" 1269.82,1976.82 r180 top locked
SB21 "Solder Bridge" "Solder Bridge" 2334.04,2108.82 r90 top locked
SB22 "Solder Bridge" "Solder Bridge" 2386.82,2108.82 r90 top locked
SB23 "Solder Bridge" "Solder Bridge" 1854.29,2108.82 r90 top locked
SB24 "Solder Bridge" "Solder Bridge" 746.82,2936.82 r270 top locked
SB25 "Solder Bridge" "Solder Bridge" 695.82,2936.82 r270 top locked
SB26 "Solder Bridge" "Solder Bridge" 644.82,2936.82 r270 top locked
SB27 "Solder Bridge" "Solder Bridge" 593.82,2936.82 r270 top locked
SB28 "Solder Bridge" "Solder Bridge" 67.82,288.82 r90 top locked
SB29 "Solder Bridge" "Solder Bridge" 4078.82,1478.82 r0 top locked
SB30 "Solder Bridge" "Solder Bridge" 4143.82,1590.82 r180 top locked
SB31 "Solder Bridge" "Solder Bridge" 4164.82,2440.82 r180 top locked
SB32 "Solder Bridge" "Solder Bridge" 4081.82,2569.82 r0 top locked
SB33 "Solder Bridge" "Solder Bridge" 4019.82,724.82 r270 top locked
SW1 "TS-1185EC-C-D-B" TS-1185EC-C-D-B 4211.82,280.82 r90 top locked
SW2 "TS-1185EC-C-D-B" TS-1185EC-C-D-B 1388.82,-27.18 r0 top locked
SW3 "TS-1185EC-C-D-B" TS-1185EC-C-D-B 1157.82,-27.18 r0 top locked
SW4 "TS-1185EC-C-D-B" TS-1185EC-C-D-B 1619.82,-27.18 r0 top locked
SW5 "TS-1185EC-C-D-B" TS-1185EC-C-D-B -34.18,590.03 r270 top locked
SW6 "TS-1185EC-C-D-B" TS-1185EC-C-D-B 4224.82,3159.82 r90 top locked
SW7 "TS-1185EC-C-D-B" TS-1185EC-C-D-B -34.18,291.04 r270 top locked
U1 "SYR837PKC" SYR837PKC 3342.58,251.58 r90 top locked
U2 "SYR838PKC" SYR838PKC 2777.07,275.2 r90 top locked
U3 "SY8088AAC" SOT-23-5 2334.18,34.39 r0 top locked
U4 "TPS563201DDCR" TPS563201DDCR 3326.82,52.82 r0 top locked
U5 "SY8088AAC" SOT-23-5 2633.82,518.82 r180 top locked
U6 "SPX3819M5-L-1-8/TR" SOT-23-5 2857.82,39.82 r0 top locked
U7 "RT9193-33GB" SOT-23-5 3059.64,557.82 r0 top locked
U8 "SPX3819M5-L-3-0/TR" SOT-23-5 3179.82,277.82 r180 bottom locked
U9 "RK808-D" "68-QFN (7x7)" 1767.87,345.19 r270 top locked
U10 "RK3399" RK3399 1826.18,1629.92 r180 top locked
U11 "LPW5209B5F-21" SOT-23-5 1516.18,3172.4 r0 bottom locked
U12 "LPW5209B5F-21" SOT-23-5 161,2857 r180 bottom locked
U13 "FUSB302BMPX" "14-MLP (2.5x2.5)" 631.82,3067.82 r0 top locked
U14 "STM32F411CCU6TR" "48-UFQFPN (7x7)" 3385.92,2868.35 r0 top locked
U15 "K4F6E3S4HM-MGCJ" FBGA-200 690.61,327.24 r90 top locked
U16 "FSEIASLD-64G" BGA-153 735.24,1421.61 r270 top locked
U17 "AP6398S" AP6398S 3444.82,2078.82 r180 top locked
U18 "K4F6E3S4HM-MGCJ" FBGA-200 690.61,870 r90 top locked
X1 "NX3215SA-32.768K-STD-MUA-8" NX3215SA-32.768K-STD-MUA-8 2050.08,567.83 r0 top locked
X2 "24MHZ" X322524MOB4SI 1459.82,1812.82 r90 bottom locked
X3 "8MHz" 5TJ480000XYLBC 3041.82,2851.82 r180 top locked
X4 "NX3215SA-32.768K-STD-MUA-8" NX3215SA-32.768K-STD-MUA-8 3200.04,3081.82 r0 top locked
X5 "37.4MHz" Q22FA12800078 3522.82,2419.82 r0 top locked

## Footprints (in the part's own frame and the unit in brackets; to place one, negate y for a bottom-side part, rotate by r counter-clockwise, add the part's x,y. Pads: shape width x height; smd on the part's side, far side on the other; paste and mask are expansions set on the pad)
5TJ480000XYLBC [mm]
  rect 1.8x1.3 smd mask+0.07: 1(-1.9,-1.15) 2(1.9,-1.15) 3(1.9,1.15) 4(-1.9,1.15)
  silkscreen extent -3.17,-1.65 2.54,1.65, body extent -2.5,-1.6 2.5,1.6, height 1
"14-MLP (2.5x2.5)" [mm]
  rect 0.58x0.3 smd: 1(-1.215,0.5) 2(-1.215,0) 3(-1.215,-0.5) 8(1.215,-0.5) 9(1.215,0) 10(1.215,0.5)
  rect 0.3x0.58 smd: 4(-0.75,-1.215) 5(-0.25,-1.215) 6(0.25,-1.215) 7(0.75,-1.215) 11(0.75,1.215) 12(0.25,1.215) 13(-0.25,1.215) 14(-0.75,1.215)
  rect 1.45x1.45 smd: 15(0,0)
  silkscreen extent -1.73,-1.3 1.27,1.3, body extent -1.24,-1.24 1.24,1.24, height 0.76
"48-UFQFPN (7x7)" [mm]
  rect 0.55x0.3 smd: 1(-3.325,2.75) 2(-3.325,2.25) 3(-3.325,1.75) 4(-3.325,1.25) 5(-3.325,0.75) 6(-3.325,0.25) 7(-3.325,-0.25) 8(-3.325,-0.75) 9(-3.325,-1.25) 10(-3.325,-1.75) 11(-3.325,-2.25) 12(-3.325,-2.75) 25(3.325,-2.75) 26(3.325,-2.25) 27(3.325,-1.75) 28(3.325,-1.25) 29(3.325,-0.75) 30(3.325,-0.25) 31(3.325,0.25) 32(3.325,0.75) 33(3.325,1.25) 34(3.325,1.75) 35(3.325,2.25) 36(3.325,2.75)
  rect 0.3x0.55 smd: 13(-2.75,-3.325) 14(-2.25,-3.325) 15(-1.75,-3.325) 16(-1.25,-3.325) 17(-0.75,-3.325) 18(-0.25,-3.325) 19(0.25,-3.325) 20(0.75,-3.325) 21(1.25,-3.325) 22(1.75,-3.325) 23(2.25,-3.325) 24(2.75,-3.325) 37(2.75,3.325) 38(2.25,3.325) 39(1.75,3.325) 40(1.25,3.325) 41(0.75,3.325) 42(0.25,3.325) 43(-0.25,3.325) 44(-0.75,3.325) 45(-1.25,3.325) 46(-1.75,3.325) 47(-2.25,3.325) 48(-2.75,3.325)
  rect 5.6x5.6 smd: 49(0,0)
  silkscreen extent -3.86,-3.61 3.61,3.61, body extent -3.56,-3.56 3.56,3.56, height 0.61